# Altium PCB PCB1.PcbDoc (part 1 of 8)
Units mil, origin at the board's own origin, x right, y up, seen from the top; angles counter-clockwise.
Board outline 1968.5 x 1968.5 mil, 4 copper layers (Top Layer, Layer 1, Layer 2, Bottom Layer), stack 23.756 mil thick; 223 components, 143 nets, 652 pads, 329 vias.
Unrouted connection lines stored in the file: 15.
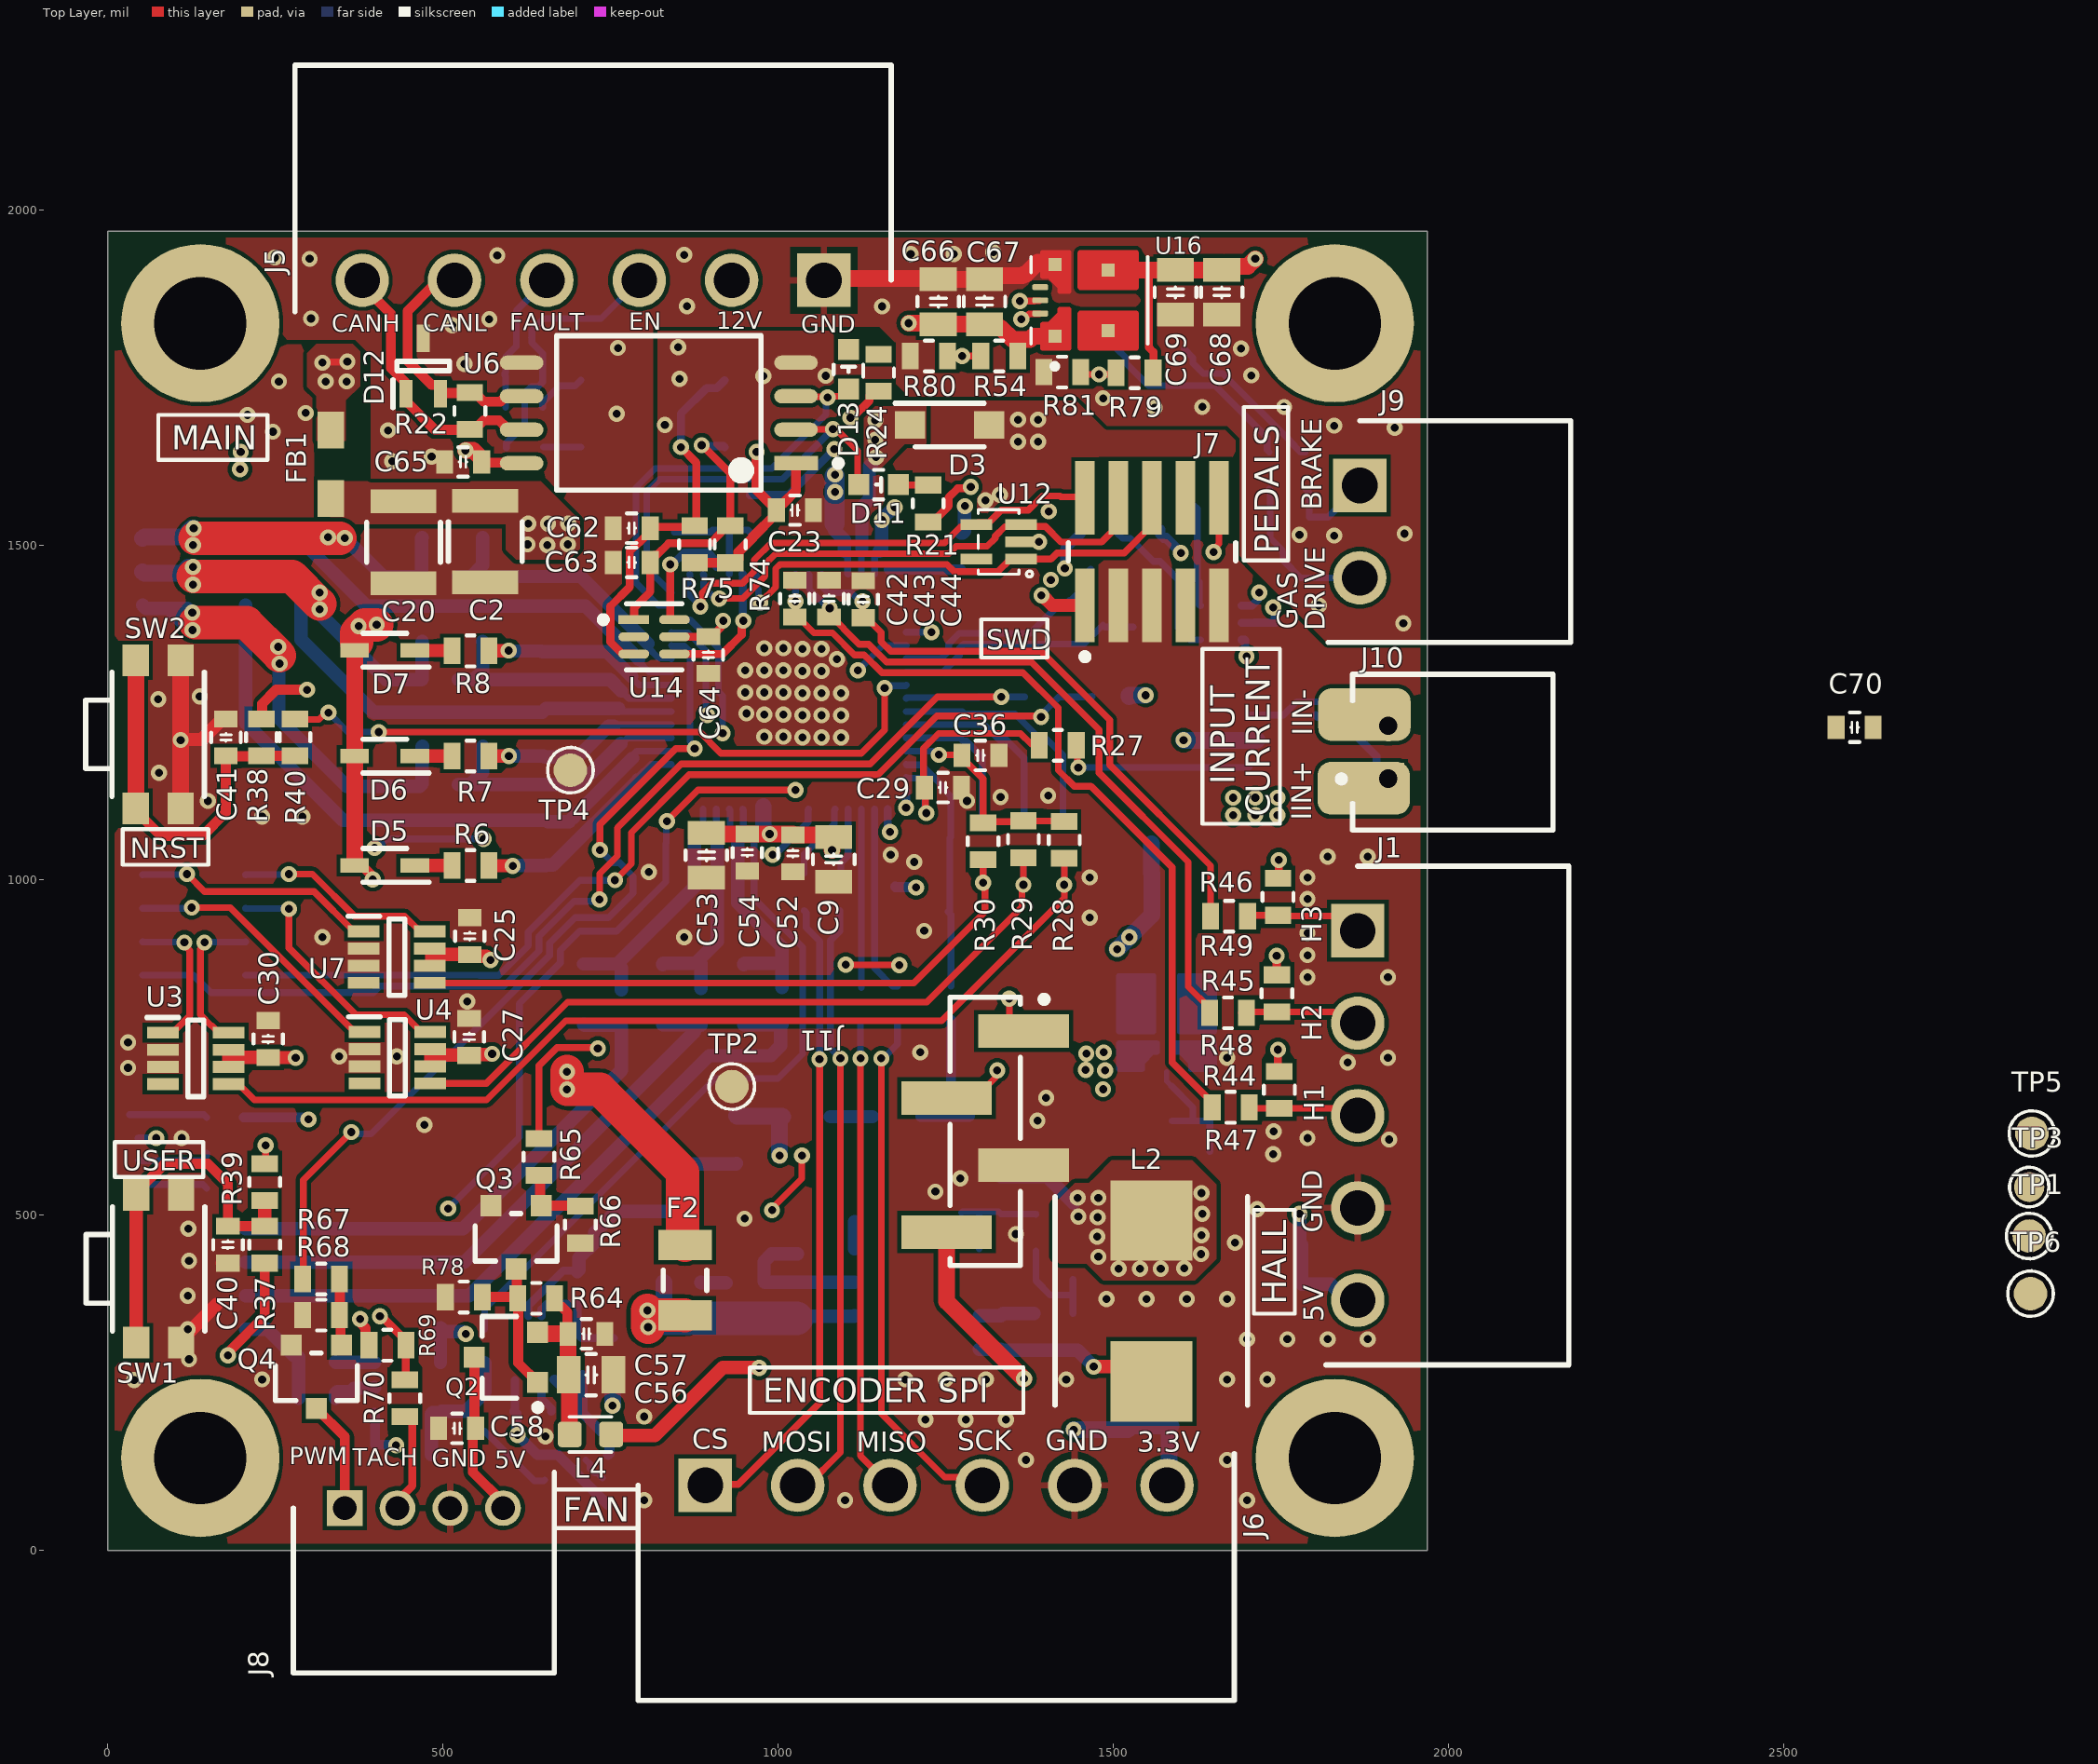
[diagram p0: Top Layer view]
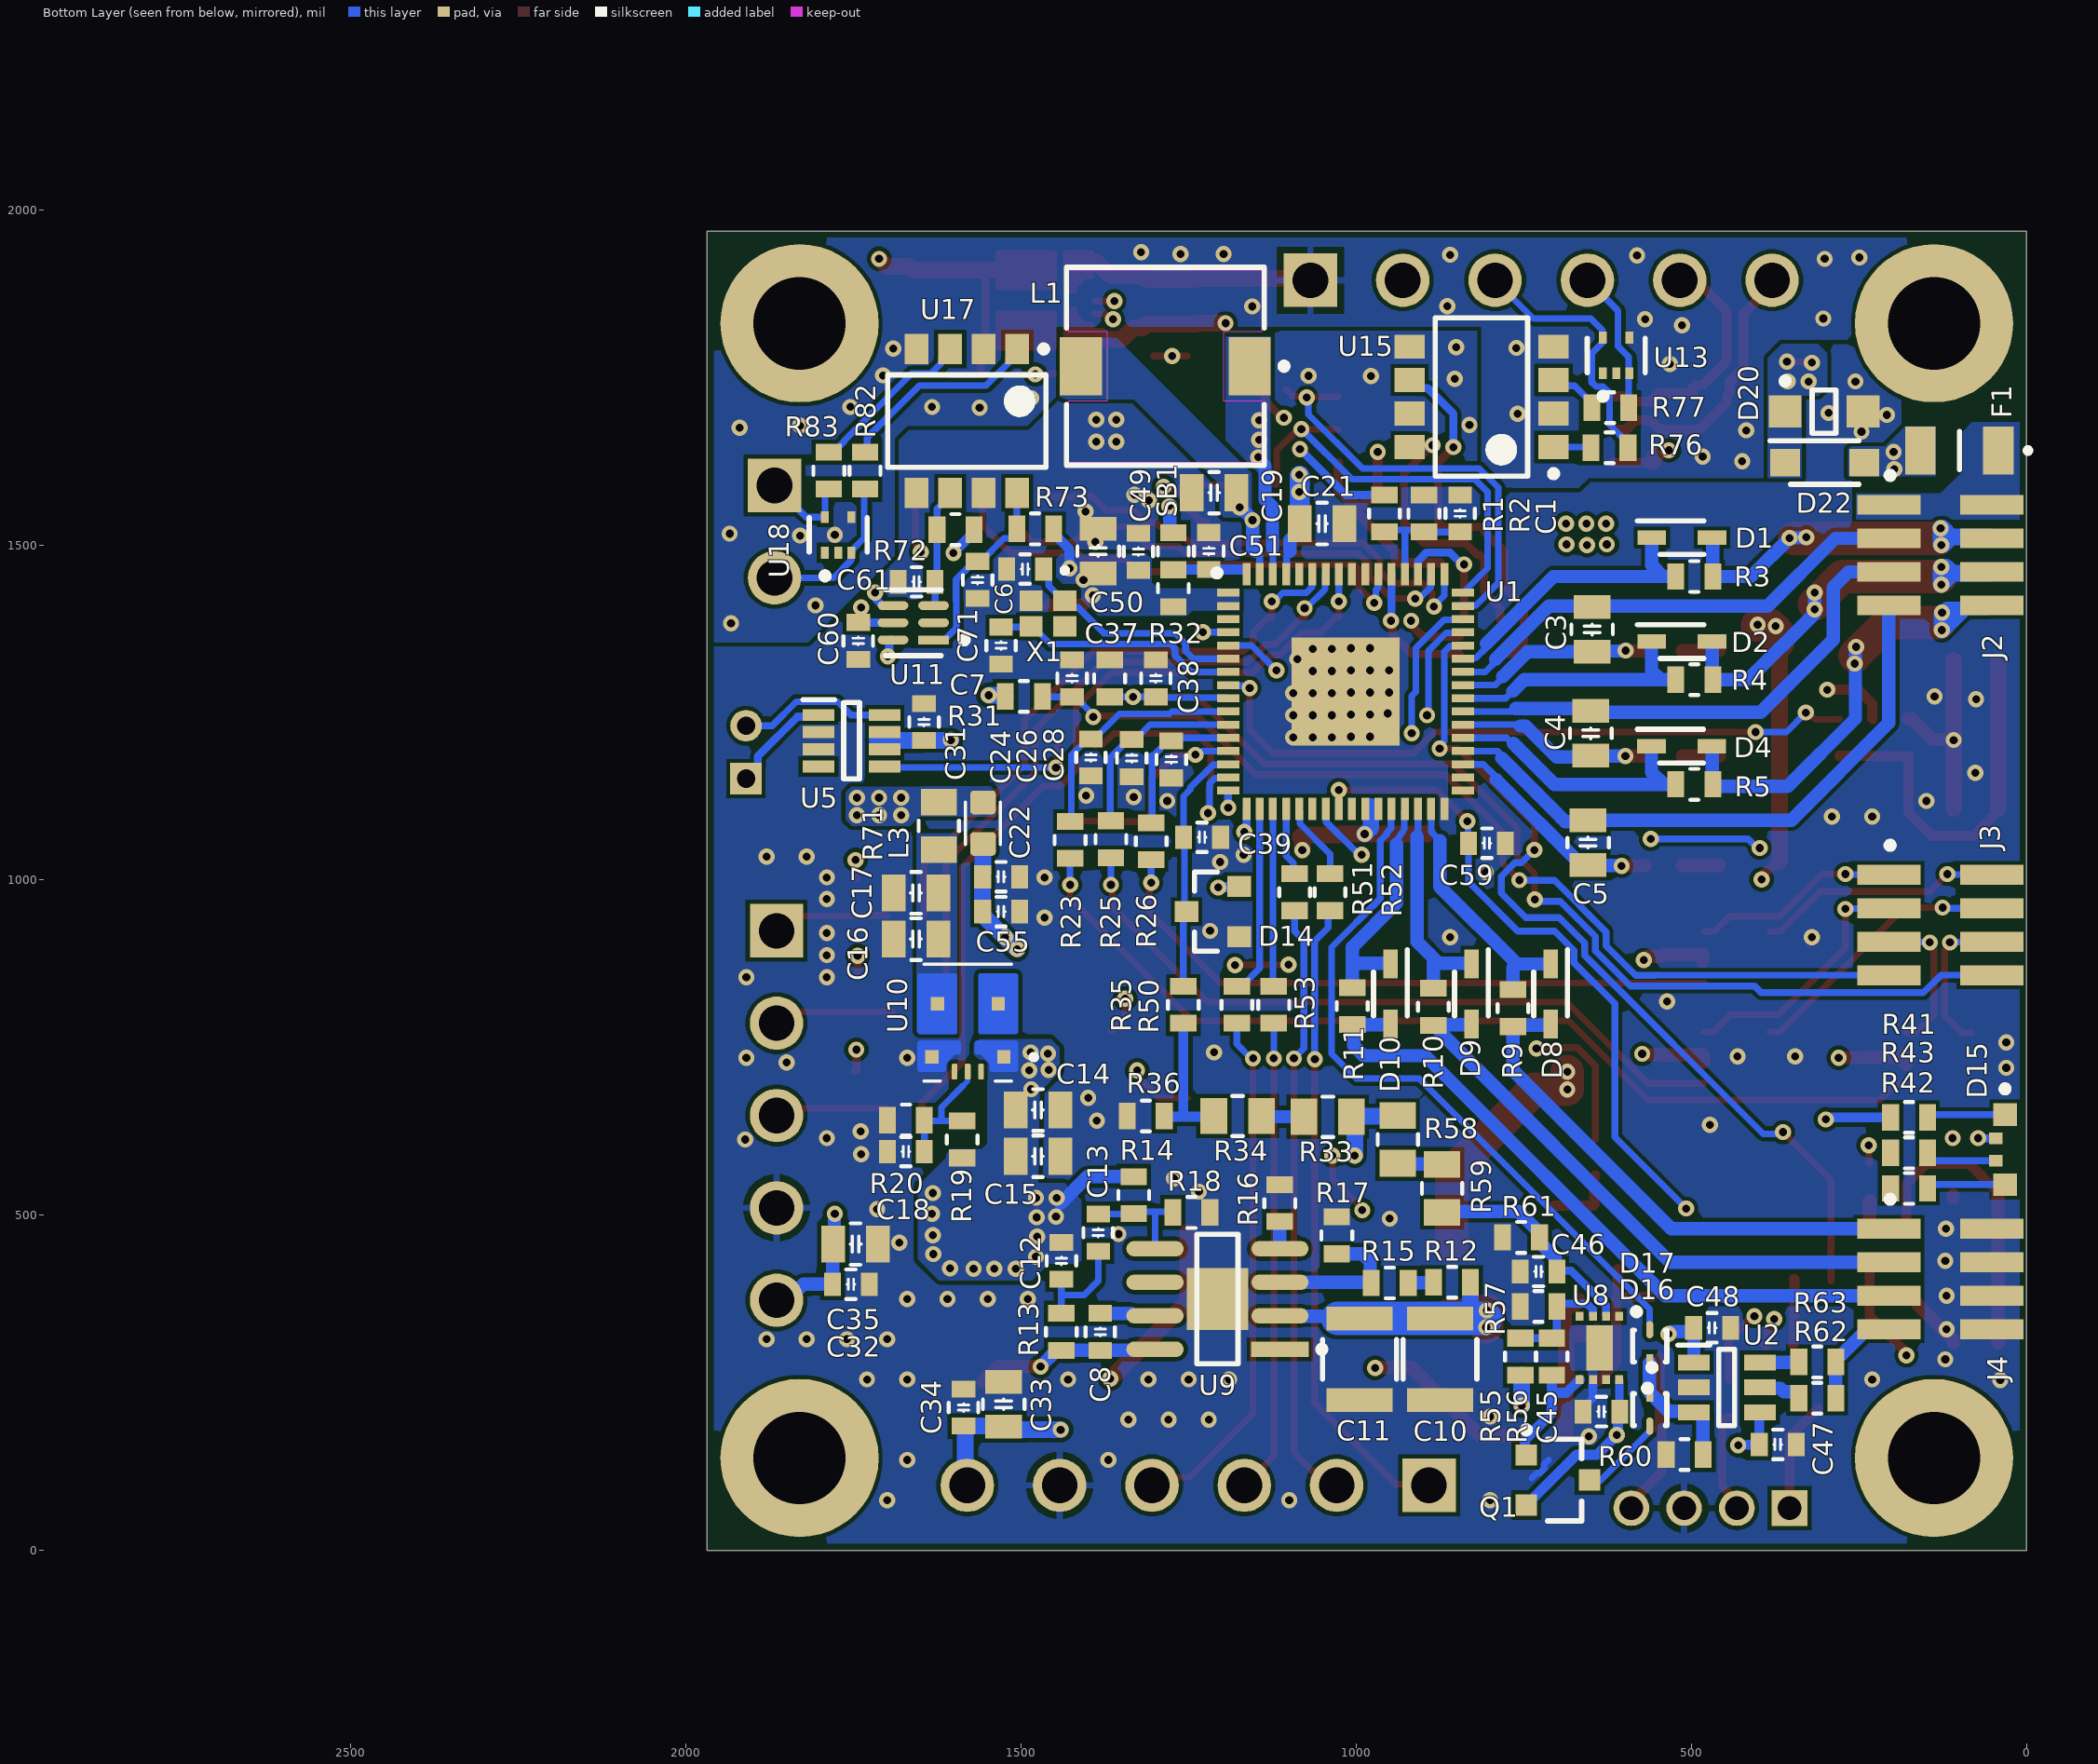
[diagram p1: Bottom Layer view, seen from below]
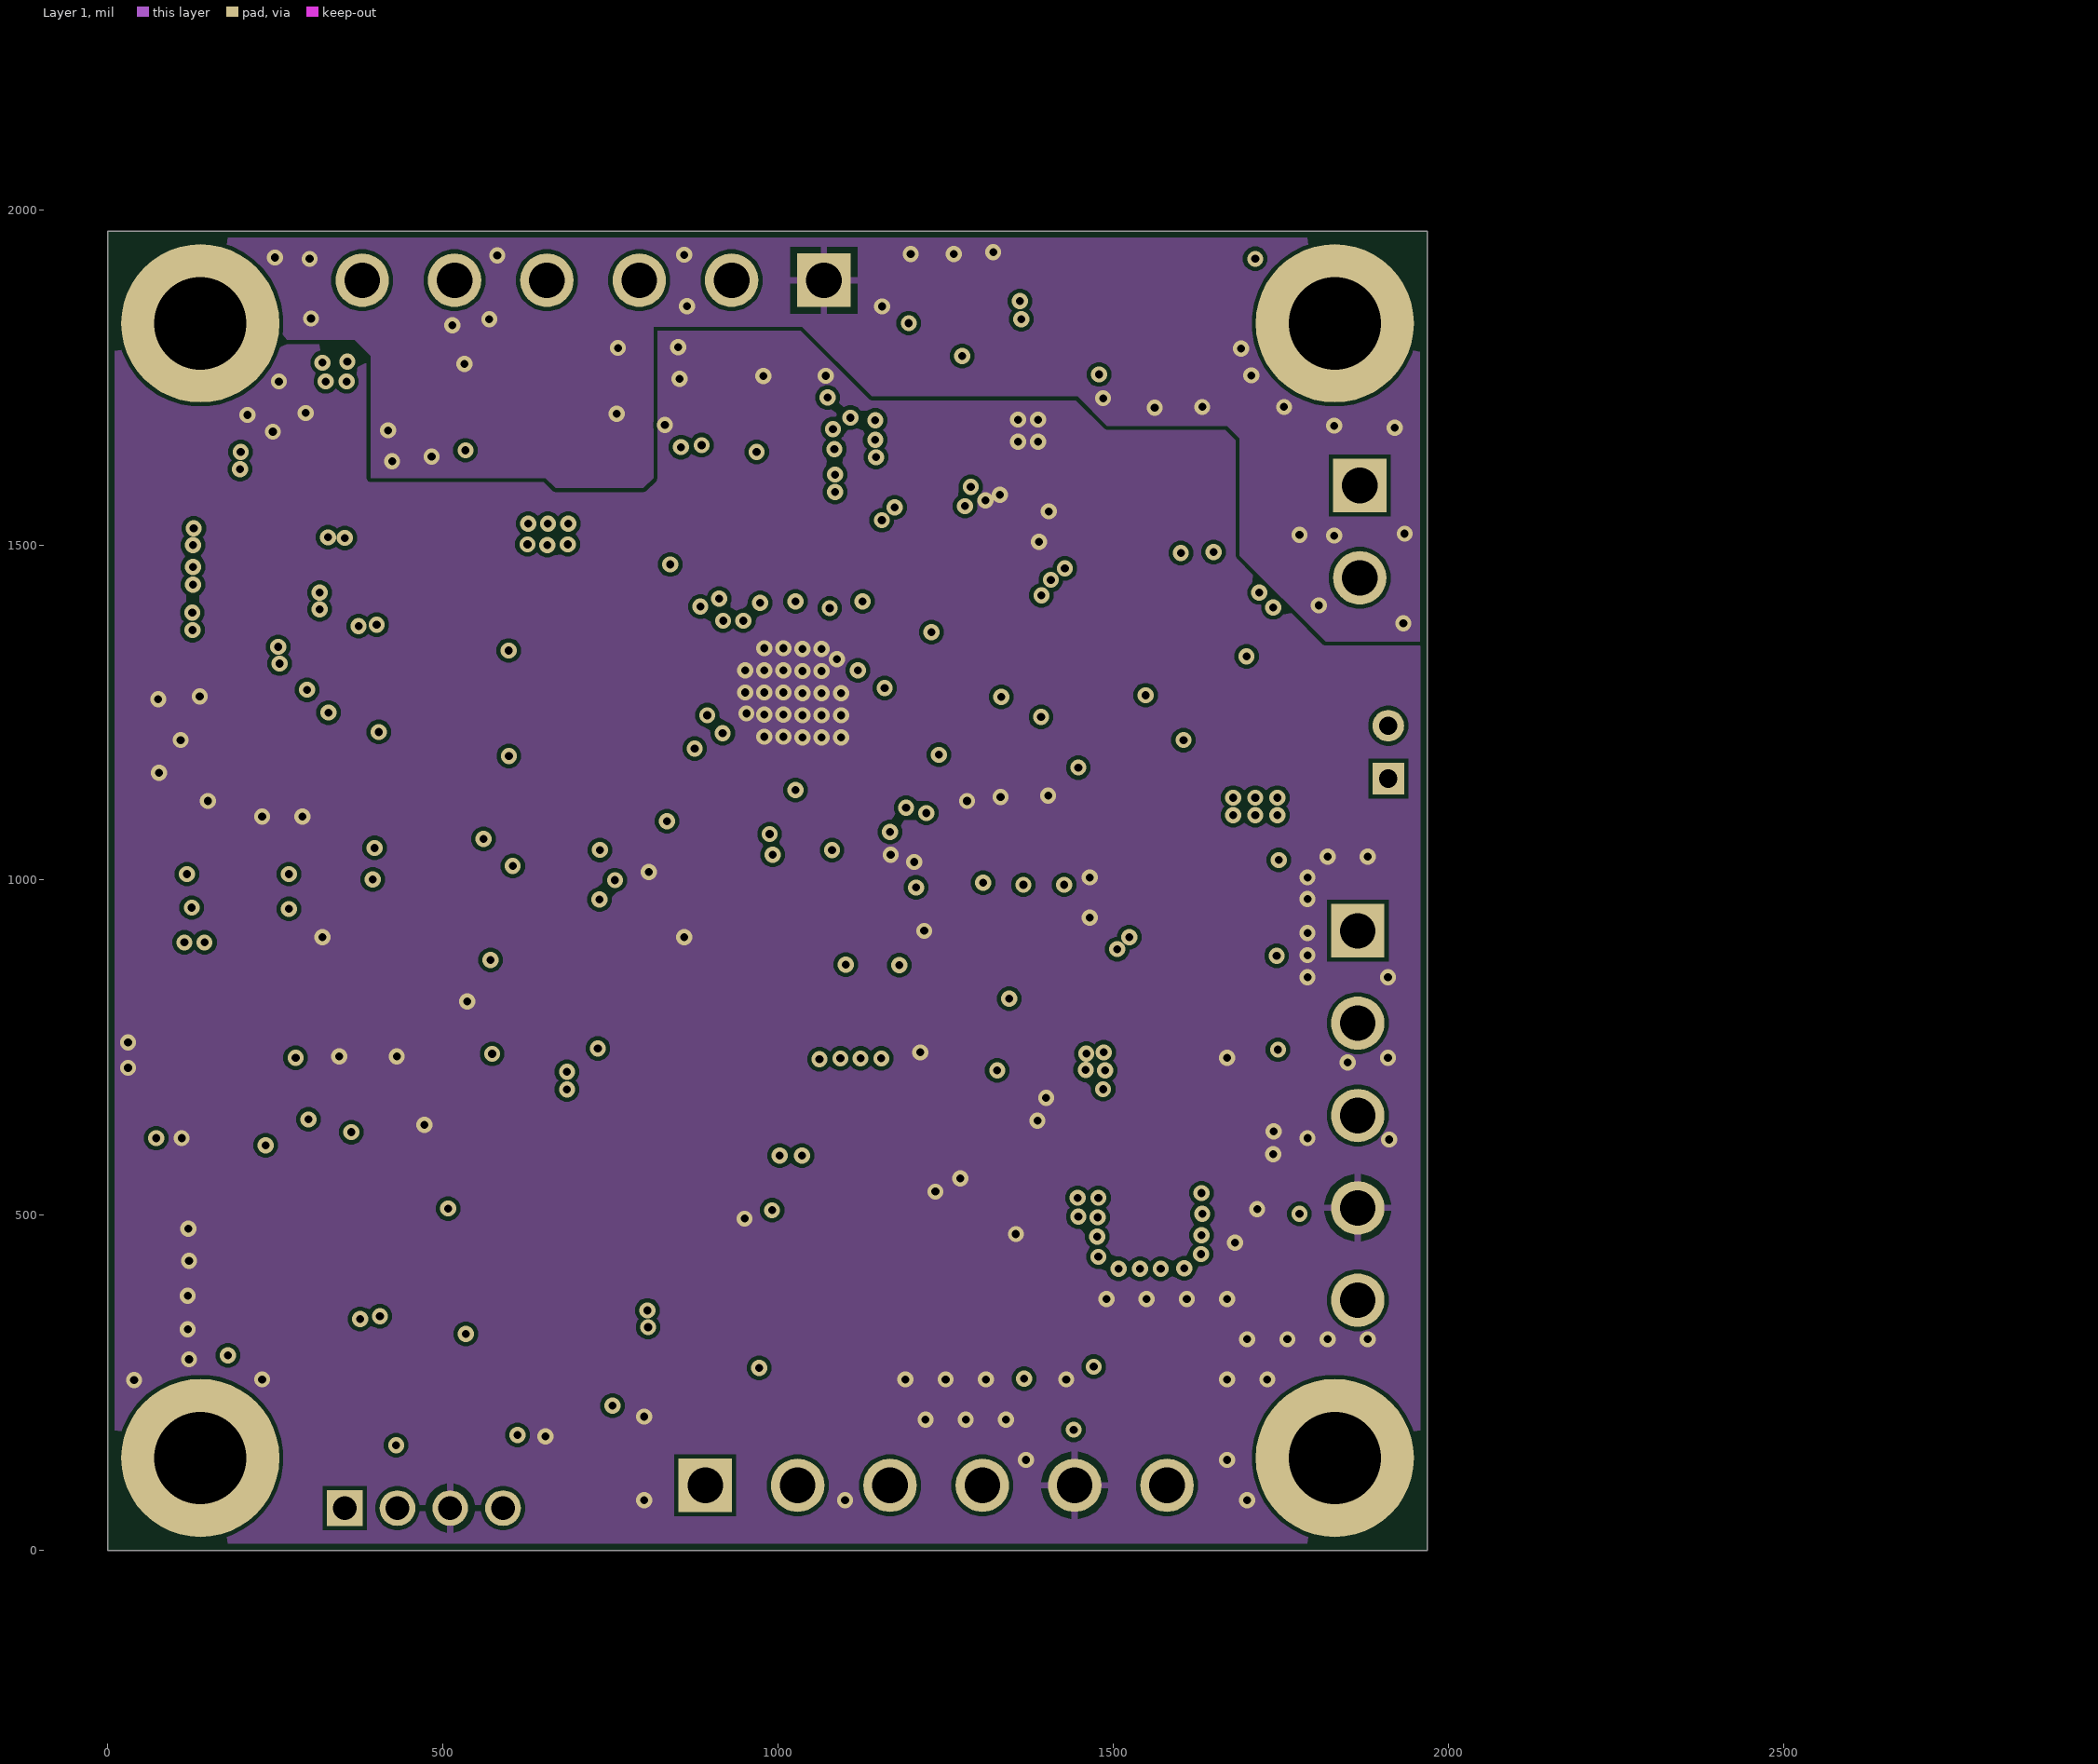
[diagram p2: Layer 1]
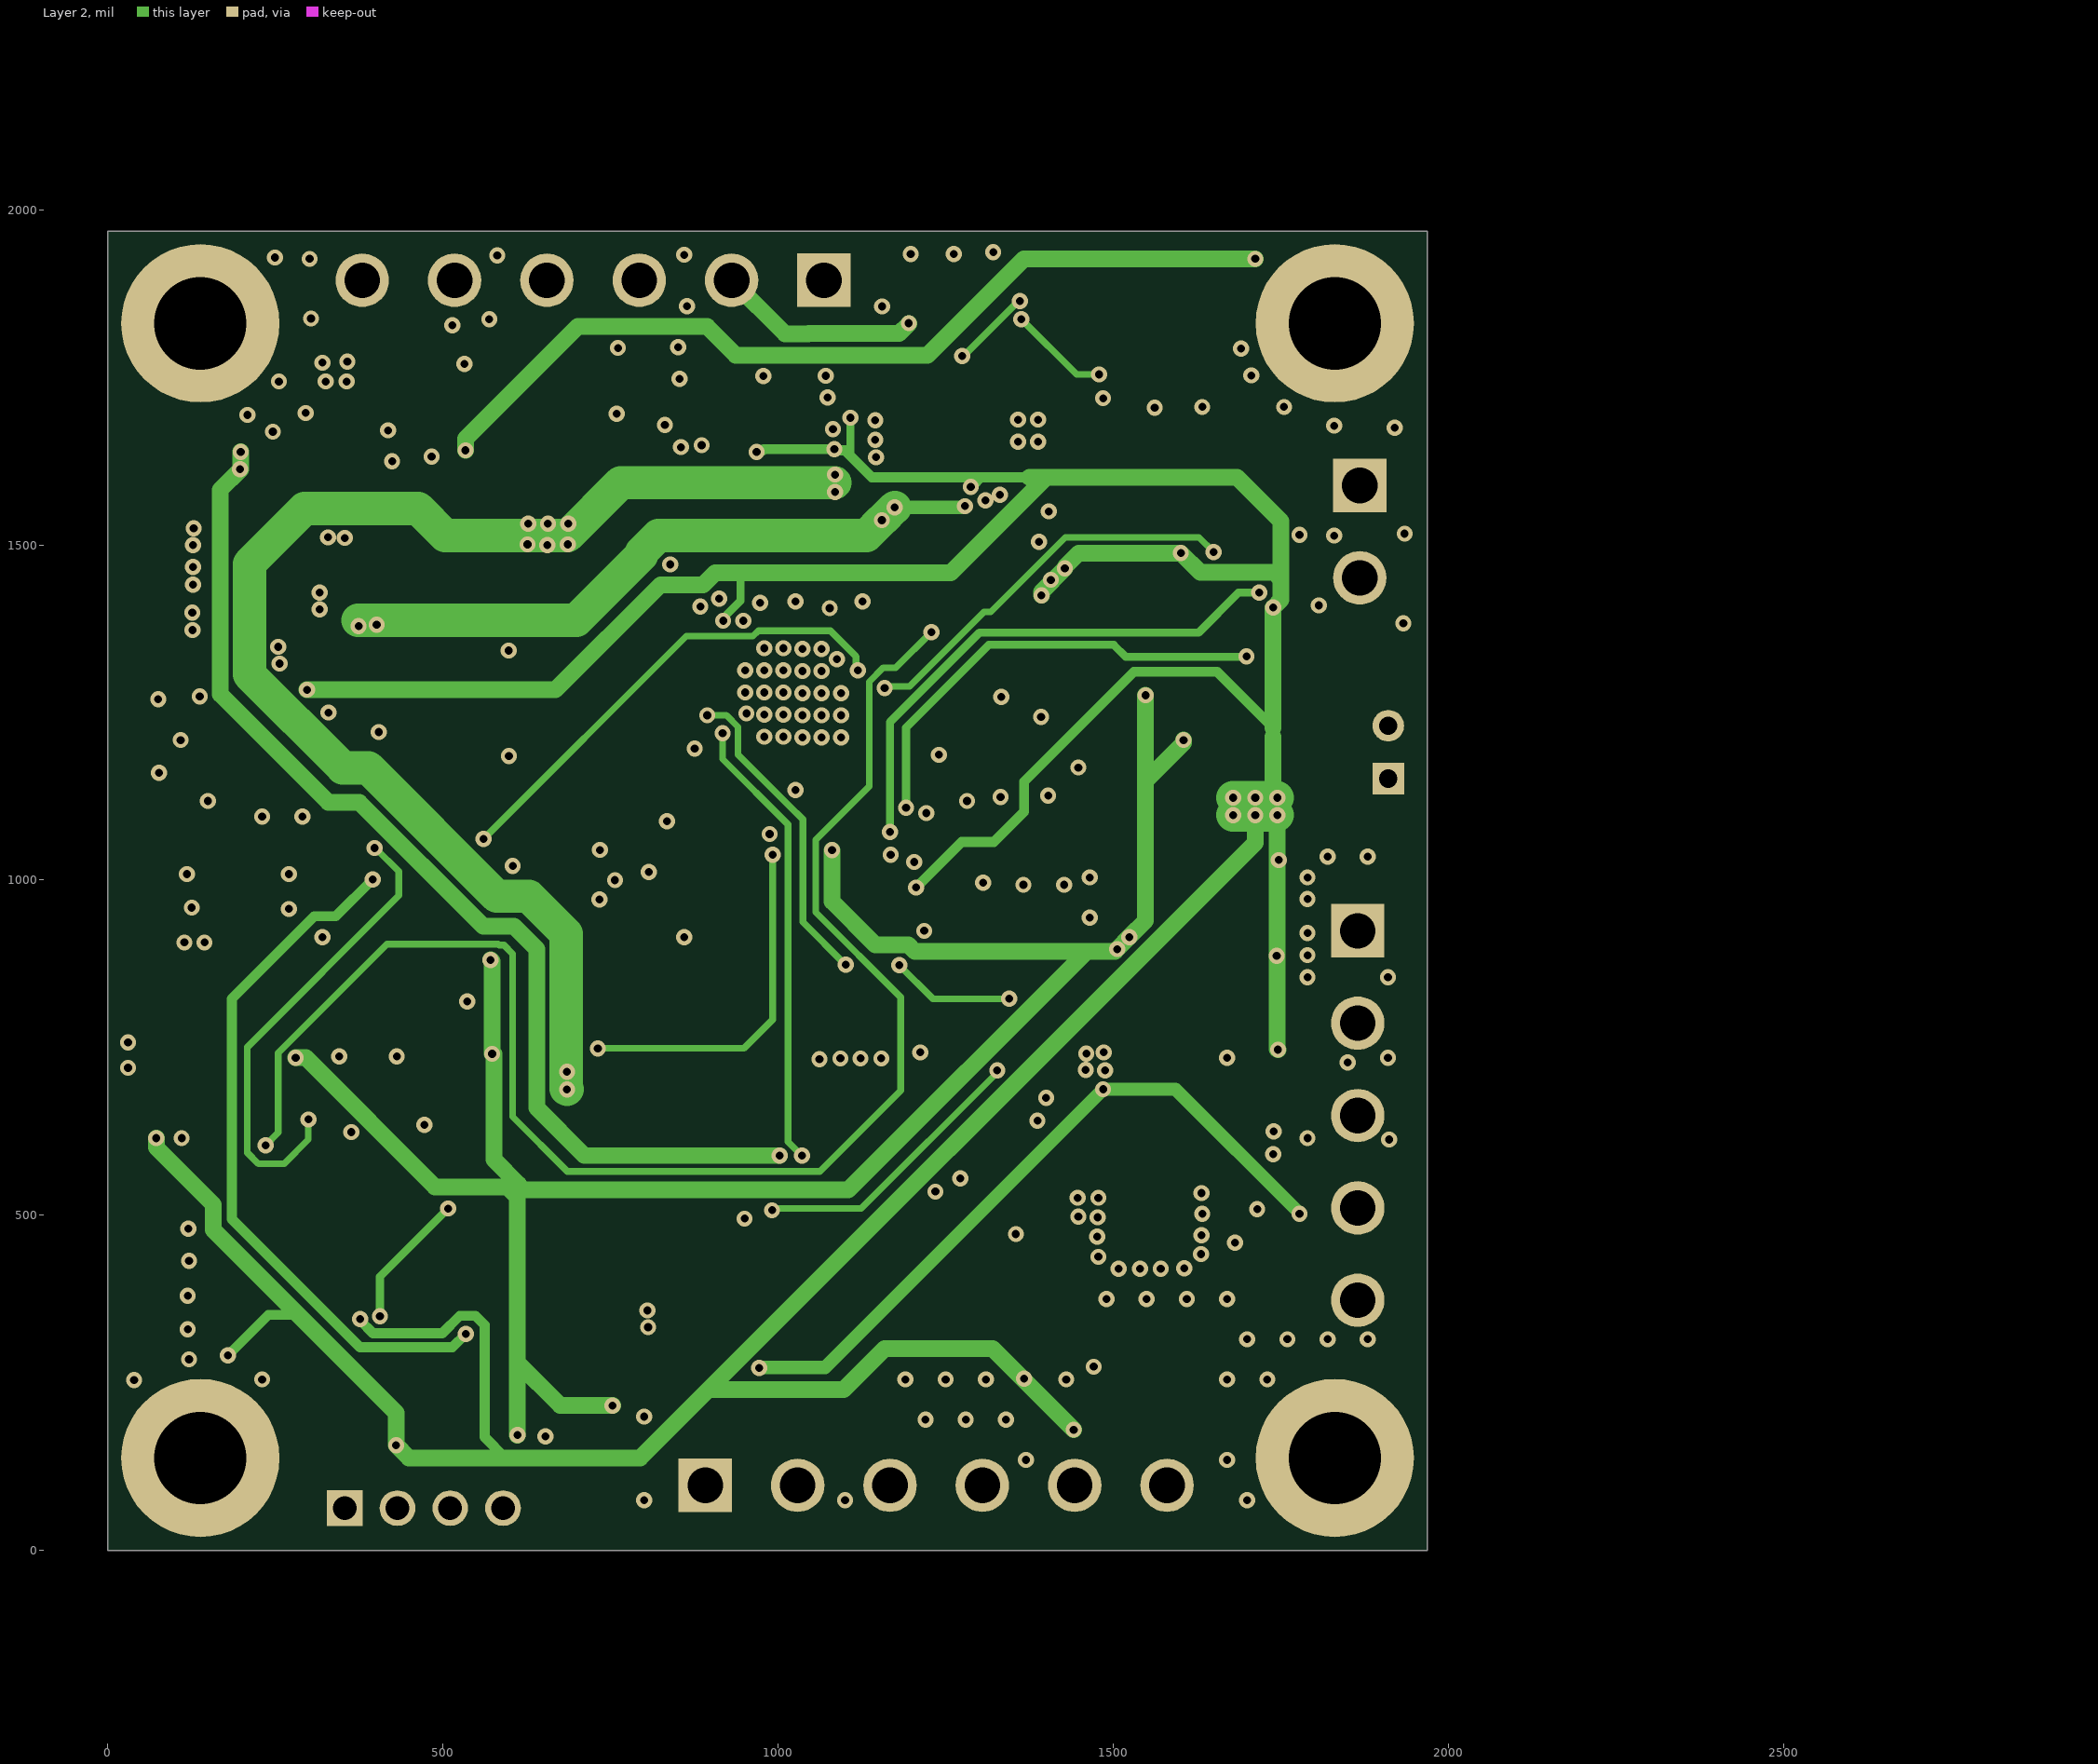
[diagram p3: Layer 2]

## Layer stack, top to bottom
Top Solder: solder mask 0.4, Solder Resist, Dk 3.5
Top Layer: signal copper 1.4
Dielectric 2: prepreg 2.8, PP-006, Dk 4.1
Layer 1: signal copper 1.378
Dielectric 1: dielectric 12.6, FR-4, Dk 4.8
Layer 2: signal copper 1.378
Dielectric 3: prepreg 2.8, PP-006, Dk 4.1
Bottom Layer: signal copper 1.4
Bottom Solder: solder mask 0.4, Solder Resist, Dk 3.5

## Board outline
0,0 0,1968.5 1968.5,1968.5 1968.5,0

## Design rules (kind name [scope] priority, off if disabled: settings)
BoardOutlineClearance [All] p1: gap=10 ignorepadtopadclearanceinfootprint=FALSE except(0: Arc-SplitContinuation Track-SplitContinuation SMDPad-SplitContinuation THPad-SplitContinuation Via-SplitContinuation Fill-SplitContinuation Poly-SplitContinuation Region-SplitContinuation Text-SplitContinuation)
Clearance "Stitching GND" [IsStitchingVia and InNet('GND') vs (IsVia and (Not IsStitchingVia)) Or IsPad] p1: gap=11.81 ignorepadtopadclearanceinfootprint=FALSE
Clearance [All] p2: gap=6 ignorepadtopadclearanceinfootprint=TRUE
DiffPairsRouting [All] p1: maxlimit=10 minlimit=10 mostfreqgap=10 toplayer_minwidth=15 toplayer_maxwidth=15 toplayer_prefwidth=15 midlayer1_minwidth=15 midlayer1_maxwidth=15 midlayer1_prefwidth=15 midlayer2_minwidth=15 midlayer2_maxwidth=15 midlayer2_prefwidth=15 bottomlayer_minwidth=15 bottomlayer_maxwidth=15 bottomlayer_prefwidth=15 maxuncoupledlength=500
PolygonConnect [All] p1: thpad.connectstyle=Relief thpad.reliefconductorwidth=10 thpad.reliefentries=4 thpad.polygonreliefangle="90 Angle" thpad.airgapwidth=10 smdpad.connectstyle=Direct smdpad.reliefconductorwidth=10 smdpad.reliefentries=4 smdpad.polygonreliefangle="90 Angle" smdpad.airgapwidth=10 via.connectstyle=Direct via.reliefconductorwidth=10 via.reliefentries=4 via.polygonreliefangle="90 Angle" via.airgapwidth=10
RoutingVias [All] p1: holewidth=12 width=24 viastyle="Through Hole" minholewidth=10 minwidth=20 maxholewidth=28 maxwidth=50
SolderMaskExpansion [All] p1: expansion=4 istentingtop=FALSE
SupplyNets "Schematic Supply Nets_11" [InNet('5V_EXT')] p1: voltage=0.000
SupplyNets "Schematic Supply Nets_10" [InNet('12V_EXT')] p2: voltage=0.000
SupplyNets "Schematic Supply Nets_9" [InNet('GND_EXT')] p3: voltage=0.000
SupplyNets "Schematic Supply Nets_8" [InNet('VM_SENSE')] p4: voltage=0.000
SupplyNets "Schematic Supply Nets_7" [InNet('5V_FAN')] p5: voltage=0.000
SupplyNets "Schematic Supply Nets_6" [InNet('3V3_TPSM')] p6: voltage=0.000
SupplyNets "Schematic Supply Nets_5" [InNet('3V3_A')] p7: voltage=0.000
SupplyNets "Schematic Supply Nets_4" [InNet('VM')] p8: voltage=0.000
SupplyNets "Schematic Supply Nets_3" [InNet('5V')] p9: voltage=0.000
SupplyNets "Schematic Supply Nets_2" [InNet('GND')] p10: voltage=0.000
SupplyNets "Schematic Supply Nets_1" [InNet('VCC')] p11: voltage=0.000
SupplyNets "Schematic Supply Nets" [InNet('3V3')] p12: voltage=0.000
Width [All] p1: maxlimit=100 minlimit=10 preferedwidth=10
29 further rules are at their usual default settings.

## Classes and differential pairs
component class power: C8 C10 C11 C12 C13 C14 C15 C16 C17 C18 C22 C55 C66 C67 C68 C69 C70 F2 L2 L3 R12 R13 R14 R15 R16 R17 R18 R19 R20 R54 R71 R79 R80 R81 TP1 TP2 TP5 TP6 U9 U10 U16
component class main: C32 C33 C34 C35 D20 D22 F1 FB1 J1 J2 J3 J4 J5 J6 J7 J8 J9 J10 J11 U12
component class stspin32g4: C1 C2 C3 C4 C5 C6 C7 C9 C19 C20 C21 C37 C38 C40 C41 C49 C50 C51 C52 C53 C54 D1 D2 D3 D4 D5 D6 D7 D8 D9 D10 D15 L1 R1 R2 R3 R4 R5 R6 R7 R8 R9 R10 R11 R31 R32 R37 R38 R39 R40 R41 R42 R43 R50 R51 R52 R53 SB1 SW1 SW2 U1 X1
component class peripherals: C23 C24 C25 C26 C27 C28 C29 C30 C31 C36 C39 C42 C43 C44 C45 C46 C47 C48 C56 C57 C58 C59 C60 C61 C62 C63 C64 C65 C71 D11 D12 D13 D14 D16 D17 L4 Q1 Q2 Q3 Q4 R21 R22 R23 R24 R25 R26 R27 R28 R29 R30 R33 R34 R35 R36 R44 R45 R46 R47 R48 R49 R55 R56 R57 R58 R59 R60 R61 R62 R63 R64 R65 R66 R67 R68 R69 R70 R72 R73 R74 R75 R76 R77 R78 R82 R83 TP3 TP4 U2 U3 U4 U5 U6 U7 U8 U11 U13 U14 U15 U17 U18
differential pair CAN: +CAN_P -CAN_N

## Components (designator, comment, footprint, x,y, rotation, side; value= is the part's Value field where it differs from the comment)
C1 "100n (0603)" C0603 845,1547 r270 bottom value=100nF
C2 "2u2 (1210)" WCAP-CSGP_1210_L3.2W2.5H2.5 563,1505 r90 top
C3 "4u7 (0805)" C0805 648,1374 r270 bottom value=4.7µF
C4 "4u7 (0805)" C0805 650,1219 r270 bottom value=4.7µF
C5 "4u7 (0805)" C0805 654,1056 r270 bottom value=4.7µF
C6 "12p (0603)" C0603 1494,1464 r180 bottom value=100nF
C7 "12p (0603)" C0603 1530,1350 r90 bottom value=100nF
C8 "1n (0603)" C0603 1382,326 r90 bottom value=100nF
C9 "4u7 (0805)" C0805 1083,1031 r270 top value=4.7µF
C10 "2u2 (1210)" WCAP-CSGP_1210_L3.2W2.5H2.5 875.02,285 r90 bottom
C11 "2u2 (1210)" WCAP-CSGP_1210_L3.2W2.5H2.5 995.02,285 r90 bottom
C12 "1n (0603)" C0603 1440,432 r90 bottom value=100nF
C13 "1n (0603)" C0603 1385,474 r270 bottom value=100nF
C14 "22u (0805)" C0805 1475,657 r0 bottom value=4.7µF
C15 "100n (0805)" C0805 1475,588 r0 bottom value=4.7µF
C16 "22u (0805)" C0805 1657,912 r180 bottom value=4.7µF
C17 "22u (0805)" C0805 1657,981 r180 bottom value=4.7µF
C18 "10n (0603)" C0603 1672,595 r180 bottom value=100nF
C19 "4u7 (0805)" C0805 1212,1578 r0 bottom value=4.7µF
C20 "2u2 (1210)" WCAP-CSGP_1210_L3.2W2.5H2.5 441,1504 r90 top
C21 "4u7 (0805)" C0805 1051,1532 r180 bottom value=4.7µF
C22 "4u7 (0603)" C0603 1530,1005 r0 bottom value=100nF
C23 "100n (0603)" C0603 1025,1552 r180 top value=100nF
C24 "2n2 (0603)" C0603 1396,1183 r90 bottom value=100nF
C25 "100n (0603)" C0603 540,916.44 r270 top value=100nF
C26 "2n2 (0603)" C0603 1335,1182 r90 bottom value=100nF
C27 "100n (0603)" C0603 539,766 r270 top value=100nF
C28 "2n2 (0603)" C0603 1276,1180 r90 bottom value=100nF
C29 "2n2 (0603)" C0603 1246,1138 r180 top value=100nF
C30 "100n (0603)" C0603 239,763 r270 top value=100nF
C31 "100n (0603)" C0603 1645,1236 r270 bottom value=100nF
C32 "100n (0603)" C0603 1754,397 r180 bottom value=100nF
C33 "4u7 (0805)" C0805 1526,218 r90 bottom value=4.7µF
C34 "100n (0603)" C0603 1586,213 r90 bottom value=100nF
C35 "4u7 (0805)" C0805 1747,457 r180 bottom value=4.7µF
C36 "2n2 (0603)" C0603 1302,1186 r180 top value=100nF
C37 "100n (0603)" C0603 1424,1301 r270 bottom value=100nF
C38 "100n (0603)" C0603 1299,1301 r270 bottom value=100nF
C39 "22n (0603)" C0603 1230,1064 r0 bottom value=100nF
C40 "100n (0603)" C0603 179,456 r270 top value=100nF
C41 "100n (0603)" C0603 176,1213 r90 top value=100nF
C42 "1n (0603)" C0603 1025,1420 r270 top value=100nF
C43 "1n (0603)" C0603 1076,1420 r270 top value=100nF
C44 "1n (0603)" C0603 1127,1419 r270 top value=100nF
C45 "2n2 (0603)" C0603 634,207 r180 bottom value=100nF
C46 "2n2 (0603)" C0603 728,416 r180 bottom value=100nF
C47 "2n2 (0603)" C0603 371,158 r0 bottom value=100nF
C48 "2n2 (0603)" C0603 469,332 r0 bottom value=100nF
C49 "100n (0603)" C0603 1325,1490 r90 bottom value=100nF
C50 "4u7 (0805)" C0805 1385,1491 r90 bottom value=4.7µF
C51 "100n (0603)" C0603 1220,1491 r90 bottom value=100nF
C52 "100n (0603)" C0603 1022,1040 r90 top value=100nF
C53 "4u7 (0805)" C0805 893,1037 r270 top value=4.7µF
C54 "100n (0603)" C0603 954,1041 r90 top value=100nF
C55 "100n (0603)" C0603 1530,953 r0 bottom value=100nF
C56 "10u (0805)" C0805 721,262 r0 top value=4.7µF
C57 "100n (0603)" C0603 714,323 r180 top value=100nF
C58 "100n (0603)" C0603 521,182 r0 top value=100nF
C59 "470p (0603)" C0603 805,1055 r0 bottom value=100nF
C60 "100n (0603)" C0603 1743,1357 r270 bottom value=100nF
C61 "1p (0603)" C0603 1656,1445 r0 bottom value=100nF
C62 "10n (0603)" C0603 781.64,1525 r180 top value=100nF
C63 "10n (0603)" C0603 781.64,1474 r180 top value=100nF
C64 "100n (0603)" C0603 896,1336 r270 top value=100nF
C65 "100n (0603)" C0603 530,1624 r0 top value=100nF
C66 "22u (0805)" C0805 1239,1863 r270 top value=4.7µF
C67 "100n (0805)" C0805 1308,1863 r270 top value=4.7µF
C68 "22u (0805)" C0805 1662,1877 r90 top value=4.7µF
C69 "22u (0805)" C0805 1593,1877 r90 top value=4.7µF
C70 "10n (0603)" C0603 2606.44,1228 r0 top value=100nF
C71 "1p (0603)" C0603 1565,1448 r270 bottom value=100nF
D1 "BAT48JFILM" SOD2513X117N 514,1511 r180 bottom
D2 "BAT48JFILM" SOD2513X117N 514,1356 r180 bottom
D3 "STPST1H100ZFY" SODFL3516X110N 1256,1679 r0 top
D4 "BAT48JFILM" SOD2513X117N 514.44,1200 r180 bottom
D5 "BAT48JFILM" SOD2513X117N 413,1022 r180 top
D6 "BAT48JFILM" SOD2513X117N 413,1185 r180 top
D7 "BAT48JFILM" SOD2513X117N 413,1343 r180 top
D8 "BAT48JFILM" SOD2513X117N 710,830 r270 bottom
D9 "BAT48JFILM" SOD2513X117N 828,830 r270 bottom
D10 "BAT48JFILM" SOD2513X117N 949,830 r270 bottom
D11 "LTST-C190KRKT" FP-LTST-C190KRKT-MFG 1150,1590 r0 top value=100µF
D12 "ESDCAN04-2BWY" SOT65P210X110-3N 470.52,1766.98 r90 top
D13 "LTST-C190KRKT" FP-LTST-C190KRKT-MFG 1105,1762 r90 top value=100µF
D14 "BAT54S-7-F" FP-SOT23-MFG#1 1214,953 r0 bottom
D15 "APFA2507LQBDSEEZGKC" FP-APFA2507LQBDSEEZGKC-MFG 22,598 r270 bottom
D16 "BAT30KFILM" FP-SOD-523-IPC_C 562,210 r270 bottom
D17 "BAT30KFILM" FP-SOD-523-IPC_C 562,304.67 r90 bottom
D20 "SMF58AT1G" ONSC-SOD-123FL-2-498_V 301.93,1699 r180 bottom
D22 "STPS2H100ZF" SODFL3516X110N 301,1623 r180 bottom
F1 "0470.500DR" 1206L075132WR 100,1641 r0 bottom
F2 "0466.375NRHF" FP-0466-MFG 861,403 r270 top
FB1 "742792096" WE-CBF_0805_L2W1.2H0.9_HC 332.66,1620.38 r270 top
J1 "1844249" SHDRRA5W80P0X350_1X5_1890X920X825P 1865,924.39 r270 top
J2 "62130821021" 62130821021 128.5,1485 r270 bottom
J3 "62130821021" 62130821021 128.5,933.03 r270 bottom
J4 "62130821021" 62130821021 128.5,405 r270 bottom
J5 "1844252" SHDRRA6W83P0X350_1X6_2240X920X825P 1068.39,1895 r0 top
J6 "1844252" SHDRRA6W83P0X350_1X6_2240X920X825P 891.41,97 r180 top
J7 "FTSH-105-01-L-DV-K" SMTC-FTSH-105-01-L-DV-K_V 1558,1490 r0 top
J8 "S4B-PH-K-S_LF__SN_" SHDRRA4W50P0X200_1X4_990X760X480P 353.26,63 r180 top
J9 "1844210" SHDRRA2W80P0X350_1X2_840X920X825P 1868,1588.8 r270 top
J10 "S2B-PH-K-S(LF)(SN)" JST-S2B-PH-K-S_V 2007,1191 r90 top
J11 "TSM-104-01-L-SV-P-TR" FP-TSM-104-01-L-SV-P-TR-MFG 1309,625 r90 top
L1 "744778118" WE-PD_7332 1284.92,1766.74 r0 bottom
L2 "SRP7050WA-330M" SRP7050WA-330M 1557,372 r90 top
L3 "MPZ1608S601ATA00" INDC1608X95N 1557,1085 r270 bottom
L4 "MPZ1608S601ATA00" INDC1608X95N 720,173 r180 top
Q1 "AO3401A" AO-SOT-23-3L_V 699,105 r180 bottom
Q2 "AO3401A" AO-SOT-23-3L_V 594,288 r180 top
Q3 "AO3400A" FP-SOT23-MFG#2 609,467 r270 top
Q4 "AO3400A" FP-SOT23-MFG#2 311,259 r270 top
R1 "68R (0603)" R0603 958,1547 r90 bottom value=10kΩ
R2 "68R (0603)" R0603 899,1547 r270 bottom value=10kΩ
R3 "68R (0603)" R0603 495.44,1453 r180 bottom value=10kΩ
R4 "68R (0603)" R0603 495.44,1299 r180 bottom value=10kΩ
R5 "68R (0603)" R0603 495.44,1143 r180 bottom value=10kΩ
R6 "68R (0603)" R0603 541,1022 r0 top value=10kΩ
R7 "68R (0603)" R0603 541,1185 r0 top value=10kΩ
R8 "68R (0603)" R0603 541,1342 r0 top value=10kΩ
R9 "68R (0603)" R0603 766,809 r270 bottom value=10kΩ
R10 "68R (0603)" R0603 885,811 r270 bottom value=10kΩ
R11 "68R (0603)" R0603 1006,812 r270 bottom value=10kΩ
R12 "100k (0603)" R0603 857,400 r180 bottom value=10kΩ
R13 "100k (0603)" R0603 1440,326 r270 bottom value=10kΩ
R14 "100k (0603)" R0603 1332,530 r90 bottom value=10kΩ
R15 "100k (0603)" R0603 950,399 r180 bottom value=10kΩ
R16 "100k (0603)" R0603 1114,518 r270 bottom value=10kΩ
R17 "100k (0603)" R0603 1029,470 r270 bottom value=10kΩ
R18 "100k (0603)" R0603 1246,504 r0 bottom value=10kΩ
R19 "100k (0603)" R0603 1588,613 r270 bottom value=10kΩ
R20 "100k (0603)" R0603 1672,642 r180 bottom value=10kΩ
R21 "2k (0603)" R0603 1224,1562 r90 top value=10kΩ
R22 "120R (0603)" R0603 540,1700 r270 top value=10kΩ
R23 "68R (0603)" R0603 1427,1060 r90 bottom value=10kΩ
R24 "2k (0603)" R0603 1150,1757 r90 top value=10kΩ
R25 "68R (0603)" R0603 1366,1061 r90 bottom value=10kΩ
R26 "68R (0603)" R0603 1306,1058 r90 bottom value=10kΩ
R27 "68R (0603)" R0603 1417.44,1201 r180 top value=10kΩ
R28 "1k (0603)" R0603 1427,1060 r270 top value=10kΩ
R29 "1k (0603)" R0603 1366,1061 r270 top value=10kΩ
R30 "1k (0603)" R0603 1306,1058 r270 top value=10kΩ
R31 "120R (0603)" R0603 1496,1274 r180 bottom value=10kΩ
R32 "120R (0603)" R0603 1368,1301 r270 bottom value=10kΩ
R33 "75k (0805)" R0805 1042.49,647 r180 bottom value=4.7Ω
R34 "75k (0805)" R0805 1177,648 r180 bottom value=4.7Ω
R35 "68R (0603)" R0603 1258,814 r90 bottom value=10kΩ
R36 "6k34 (0603)" R0603 1314,648 r180 bottom value=10kΩ
R37 "10k (0603)" R0603 234,456 r270 top value=10kΩ
R38 "10k (0603)" R0603 229,1213 r90 top value=10kΩ
R39 "200R (0603)" R0603 234,549.44 r90 top value=10kΩ
R40 "200R (0603)" R0603 279,1213 r90 top value=10kΩ
R41 "680R (0603)" R0603 175,646 r0 bottom value=10kΩ
R42 "270R (0603)" R0603 175,540 r0 bottom value=10kΩ
R43 "270R (0603)" R0603 175,593 r0 bottom value=10kΩ
R44 "2k2 (0603)" R0603 1748,687 r90 top value=10kΩ
R45 "2k2 (0603)" R0603 1744.44,831 r90 top value=10kΩ
R46 "2k2 (0603)" R0603 1746,975 r90 top value=10kΩ
R47 "100R (0603)" R0603 1675.44,661 r180 top value=10kΩ
R48 "100R (0603)" R0603 1671.44,802 r180 top value=10kΩ
R49 "100R (0603)" R0603 1673,946 r180 top value=10kΩ
R50 "33R (0603)" R0603 1178,814 r270 bottom value=10kΩ
R51 "33R (0603)" R0603 1092,982 r270 bottom value=10kΩ
R52 "33R (0603)" R0603 1039,982 r90 bottom value=10kΩ
R53 "33R (0603)" R0603 1123,814 r270 bottom value=10kΩ
R54 "100k (0603)" R0603 1330,1782 r0 top value=10kΩ
R55 "1k (0603)" R0603 755,289 r90 bottom value=10kΩ
R56 "1k (0603)" R0603 708,289 r270 bottom value=10kΩ
R57 "1k (0603)" R0603 728,364 r0 bottom value=10kΩ
R58 "75k (0805)" R0805 938,613 r90 bottom value=4.7Ω
R59 "75k (0805)" R0805 872,540 r90 bottom value=4.7Ω
R60 "1k (0603)" R0603 510,143 r0 bottom value=10kΩ
R61 "6k34 (0603)" R0603 754,467 r180 bottom value=10kΩ
R62 "1k (0603)" R0603 312,227 r0 bottom value=10kΩ
R63 "1k (0603)" R0603 312,281 r0 bottom value=10kΩ
R64 "47k (0603)" R0603 639,376 r180 top value=10kΩ
R65 "100R (0603)" R0603 643,587 r270 top value=10kΩ
R66 "100k (0603)" R0603 705,486 r270 top value=10kΩ
R67 "100R (0603)" R0603 318,404.93 r0 top value=10kΩ
R68 "100k (0603)" R0603 318,351 r180 top value=10kΩ
R69 "100k (0603)" R0603 417,306 r180 top value=10kΩ
R70 "100k (0603)" R0603 443,227 r90 top value=10kΩ
R71 "75k (0805)" R0805 1623,1081 r270 bottom value=4.7Ω
R72 "1k (0603)" R0603 1598,1523 r180 bottom value=10kΩ
R73 "1k (0603)" R0603 1479,1524 r180 bottom value=10kΩ
R74 "22k (0603)" R0603 928.46,1500.96 r270 top value=10kΩ
R75 "22k (0603)" R0603 875.46,1500.96 r270 top value=10kΩ
R76 "680R (0603)" R0603 622,1645 r0 bottom value=10kΩ
R77 "680R (0603)" R0603 621,1705 r0 bottom value=10kΩ
R78 "10k (0603)" R0603 531,378 r180 top value=10kΩ
R79 "100k (0603)" R0603 1532,1757 r0 top value=10kΩ
R80 "100k (0603)" R0603 1225,1782 r0 top value=10kΩ
R81 "100k (0603)" R0603 1424,1758 r0 top value=10kΩ
R82 "680R (0603)" R0603 1733,1611 r90 bottom value=10kΩ
R83 "680R (0603)" R0603 1787,1611 r90 bottom value=10kΩ
SB1 "triple_solder_jumper" triple_solder_jumper 1273,1463 r90 bottom
SW1 "434351045816" 434351045816 75.66,420 r270 top
SW2 "434351045816" 434351045816 75,1217.5 r270 top
TP1 "TP" Test_Point_50 2867,469 r0 top
TP2 "TP" Test_Point_50 931,692 r0 top
TP3 "TP" Test_Point_45 2867,542 r0 top
TP4 "TP" Test_Point_50 690,1164 r0 top
TP5 "TP" Test_Point_50 2871,622 r0 top
TP6 "TP" Test_Point_50 2869,383 r0 top
U1 "STSPIN32G4" QFN50P900X900X100-65N-D 1016,1281.2 r180 bottom
U2 "PM8851D" SOT95P280X145-6N 447,243 r180 bottom
U3 "INA241A2IDDFR" SOT65P280X110-8N 131,734 r0 top
U4 "INA241A2IDDFR" SOT65P280X110-8N 432,735 r0 top
U5 "INA241A1IDDFR" SOT65P280X110-8N 1753,1208 r180 bottom
U6 "ISO1042QDWVRQ1" FP-DWV0008A-IPC_C 822,1697 r180 top
U7 "INA241A2IDDFR" SOT65P280X110-8N 431,885 r0 top
U8 "TS3011IYQ3T" SON50P200X200X80-9N 637,302 r270 bottom
U9 "LM5164QDDARQ1" FP-DDA0008A-IPC_B 1207,375 r0 bottom
U10 "TPSM863253RDXR" TPSM863253RDXR 1579.67,789 r0 bottom
U11 "SN74LVC2G14IDCKRQ1" FP-DCK0006A-IPC_C 1661,1384 r0 bottom
U12 "ESDALC6V1W5" ESDALC6V1W5 1329.16,1504.72 r90 top
U13 "TPD2E2U06DRLR" FP-DRL0005A-MFG 612,1783 r90 bottom
U14 "SN74LVC2G14IDCKRQ1" FP-DCK0006A-IPC_C 815,1363 r0 top
U15 "ILD207T" VISH-SOIC-8_C_V 813,1721 r0 bottom
U16 "TPSM863253RDXR" TPSM863253RDXR 1466,1865 r90 top
U17 "ILD207T" VISH-SOIC-8_C_V 1581,1685 r270 bottom
U18 "TPD2E2U06DRLR" FP-DRL0005A-MFG 1773,1515 r90 bottom
X1 "ABM11W-24.0000MHZ-8-D1X-T3" XTAL_ABM11W-24.0000MHZ-8-D1X-T3 1460,1398 r270 bottom

## Footprints (in the part's own frame and the unit in brackets; to place one, negate y for a bottom-side part, rotate by r counter-clockwise, add the part's x,y. Pads: shape width x height; smd on the part's side, far side on the other; paste and mask are expansions set on the pad)
1206L075132WR [mm]
  rect 1.16x1.82 smd: 1(-1.475,0) 2(1.475,0)
  silkscreen extent -2.7,-0.72 0,0.72, body extent -1.6,-0.83 1.6,0.83, height 1.25
62130821021 [mm] "Pin Header, pitch 1.27 mm, SMD, Vertical, dual row, 8p"
  rect 0.75x2.4 smd: 1(-1.905,-1.95) 2(-1.905,1.95) 3(-0.635,-1.95) 4(-0.635,1.95) 5(0.635,-1.95) 6(0.635,1.95) 7(1.905,-1.95) 8(1.905,1.95)
  silkscreen extent -3.14,-2.02 -2.9,-1.78, body extent -2.54,-2.55 2.54,2.55, height 5.9
434351045816 [mm] "3.5x4.7 mm SMD side push"
  rect 1.2x1 smd: A1(-2.8,0.85) A2(2.8,0.85) B1(-2.8,-0.85) B2(2.8,-0.85)
  silkscreen extent -2.35,-2.75 2.35,1.75, body extent -3.2,-2.75 3.2,1.75, height 1.65
AO-SOT-23-3L_V [mm] "SOT23, 3-Leads, Body 3.1x1.8mm, Pitch 0.95mm"
  rect 0.8x0.8 smd: 1(-1.2,0.95) 2(-1.2,-0.95) 3(1.2,0)
  silkscreen extent -1.33,-1.55 0.9,2.02, body extent -1.5,-1.55 1.5,1.55, height 1.25
C0603 [mm]
  rect 0.64x0.89 smd: 1(-0.7,0) 2(0.7,0)
  silkscreen extent -0.18,-0.56 0.18,0.56, body extent -0.8,-0.4 0.8,0.4, height 0.5
C0805 [mm]
  rect 0.9x1.4 smd: 1(-0.85,0) 2(0.85,0)
  silkscreen extent -0.2,-0.79 0.2,0.79, body extent -1.1,-0.7 1.1,0.7, height 1.35
ESDALC6V1W5 [mm]
  rect 0.4x1.2 smd: 1(-0.65,-0.85) 2(0,-0.85) 3(0.65,-0.85) 4(0.65,0.85) 5(-0.65,0.85)
  silkscreen extent -1.33,-1.28 1.22,0.77, body extent -1.15,-1.05 1.15,1.05, height 1.1
FP-0466-MFG [mil]
  rect 45x80 smd paste+0 mask+0: 1(-52.5,0) 2(52.5,0)
  silkscreen extent -15,-32 15,32, body extent -79,-44 79,44, height 10
FP-APFA2507LQBDSEEZGKC-MFG [mm]
  rect 0.85x0.9 smd paste+0 mask+0: 1(-1.325,-0.25) 4(1.325,-0.25)
  rect 0.45x0.5 smd paste+0 mask+0: 2(-0.425,-0.6) 3(0.425,-0.6)
  silkscreen extent -2.42,-0.38 -2.18,-0.13, body extent -1.25,-0.5 1.25,0.5, height 0.8
FP-DCK0006A-IPC_C [mm]
  rect 1.164x0.336 smd paste+0 mask+0: 1(-0.77,0.65)
  rrect100% 1.164x0.336 smd paste+0 mask+0: 2(-0.77,0) 3(-0.77,-0.65) 4(0.77,-0.65) 5(0.77,0) 6(0.77,0.65)
  silkscreen extent -2.05,-1.25 1.05,1.25
FP-DDA0008A-IPC_B [mm]
  rect 2.174x0.582 smd paste+0 mask+0: 1(-2.366,1.905)
  rrect100% 2.174x0.582 smd paste+0 mask+0: 2(-2.366,0.635) 3(-2.366,-0.635) 4(-2.366,-1.905) 5(2.366,-1.905) 6(2.366,-0.635) 7(2.366,0.635) 8(2.366,1.905)
  rect 2.34x2.34 smd paste-1000 mask+0: 9(0,0)
  silkscreen extent -4.08,-2.45 0.78,2.45, body extent -3,-2.45 3,2.45, height 1.7
FP-DRL0005A-MFG [mm]
  rect 0.45x0.3 smd paste-1000 mask-1000: 1(-0.675,0.5) 2(-0.675,0) 3(-0.675,-0.5) 4(0.675,-0.5) 5(0.675,0.5)
  silkscreen extent -1.67,-1.1 0.65,1.1, body extent -0.8,-0.8 0.8,0.8, height 0.6
FP-DWV0008A-IPC_C [mil]
  rect 65.12x21.34 smd paste+0 mask+0: 1(-204.74,75)
  rrect100% 65.12x21.34 smd paste+0 mask+0: 2(-204.74,25) 3(-204.74,-25) 4(-204.74,-75) 5(204.74,-75) 6(204.74,-25) 7(204.74,25) 8(204.74,75)
  silkscreen extent -273,-115 153,115, body extent -226,-115 226,115, height 110
FP-LTST-C190KRKT-MFG [mm]
  rect 0.8x0.8 smd paste+0: 1(-0.75,0) 2(0.75,0)
  silkscreen extent -0.18,-0.56 0.18,0.56, body extent -1.25,-0.55 1.25,0.55, height 0.25
FP-SOD-523-IPC_C [mil]
  rect 25.95x10.73 smd paste+0 mask+0: 1(-24.67,0)
  rrect100% 25.95x10.73 smd paste+0 mask+0: 2(24.67,0)
  silkscreen extent -68,-26 24,26, body extent -31,-16 31,16, height 28
FP-SOT23-MFG#1 [mm]
  rect 0.9x0.8 smd paste+0 mask+0: 1(-1,0.95) 2(-1,-0.95) 3(1,0)
  silkscreen extent -0.18,-1.5 0.7,1.5, body extent -1.2,-1.45 1.2,1.45, height 1.1
FP-SOT23-MFG#2 [mm]
  rect 0.8x0.8 smd paste+0 mask+0: 1(-1.2,0.95) 2(-1.2,-0.95) 3(1.2,0)
  silkscreen extent -0.9,-1.55 0.9,1.55, body extent -1.7,-1.78 1.7,1.78, height 0.25
FP-TSM-104-01-L-SV-P-TR-MFG [mil]
  rect 50x135 smd paste+0 mask+0: 1(150,-57.5) 2(50,57.5) 3(-50,-57.5) 4(-150,57.5)
  silkscreen extent -200,-93 202,53, body extent -204,-129 204,129, height 10
INDC1608X95N [mm]
  rrect30% 0.9x0.97 smd: 1(-0.785,0) 2(0.785,0)
  silkscreen extent -0.8,-0.66 0.8,0.66, body extent -0.8,-0.4 0.8,0.4, height 0.95
JST-S2B-PH-K-S_V [mm] "THD, 2-Leads, Body 7.6x5.9mm, Pitch 2mm"
  rect 1.2x1.2 hole 0.7: 1(-1,2.45)
  round 1.2 hole 0.7: 2(1,2.45)
  silkscreen extent -2.95,-3.8 2.95,4.35, body extent -2.95,-3.8 2.95,3.8, height 4.8
ONSC-SOD-123FL-2-498_V [mm] "SOD, 2-Leads, Body 2.7x1.65mm"
  rect 1.25x1.22 smd: 1(-1.475,0) 2(1.475,0)
  silkscreen extent -1.6,-0.82 0.45,1.28, body extent -1.35,-0.82 1.35,0.82, height 0.98
QFN50P900X900X100-65N-D [mm]
  rect 0.85x0.3 smd: 1(-4.45,3.75) 2(-4.45,3.25) 3(-4.45,2.75) 4(-4.45,2.25) 5(-4.45,1.75) 6(-4.45,1.25) 7(-4.45,0.75) 8(-4.45,0.25) 9(-4.45,-0.25) 10(-4.45,-0.75) 11(-4.45,-1.25) 12(-4.45,-1.75) 13(-4.45,-2.25) 14(-4.45,-2.75) 15(-4.45,-3.25) 16(-4.45,-3.75) 33(4.45,-3.75) 34(4.45,-3.25) 35(4.45,-2.75) 36(4.45,-2.25) 37(4.45,-1.75) 38(4.45,-1.25) 39(4.45,-0.75) 40(4.45,-0.25) 41(4.45,0.25) 42(4.45,0.75) 43(4.45,1.25) 44(4.45,1.75) 45(4.45,2.25) 46(4.45,2.75) 47(4.45,3.25) 48(4.45,3.75)
  rect 0.3x0.85 smd: 17(-3.75,-4.45) 18(-3.25,-4.45) 19(-2.75,-4.45) 20(-2.25,-4.45) 21(-1.75,-4.45) 22(-1.25,-4.45) 23(-0.75,-4.45) 24(-0.25,-4.45) 25(0.25,-4.45) 26(0.75,-4.45) 27(1.25,-4.45) 28(1.75,-4.45) 29(2.25,-4.45) 30(2.75,-4.45) 31(3.25,-4.45) 32(3.75,-4.45) 49(3.75,4.45) 50(3.25,4.45) 51(2.75,4.45) 52(2.25,4.45) 53(1.75,4.45) 54(1.25,4.45) 55(0.75,4.45) 56(0.25,4.45) 57(-0.25,4.45) 58(-0.75,4.45) 59(-1.25,4.45) 60(-1.75,4.45) 61(-2.25,4.45) 62(-2.75,4.45) 63(-3.25,4.45) 64(-3.75,4.45)
  rect 4.1x4.1 smd: 65(0,0)
  silkscreen extent -5,4.38 -4.75,4.62, body extent -4.55,-4.55 4.55,4.55, height 1
R0603 [mm]
  rect 0.64x1 smd: 1(-0.7,0) 2(0.7,0)
  silkscreen extent -0.15,-0.58 0.15,0.58, body extent -0.9,-0.5 0.9,0.5, height 0.56
R0805 [mil]
  rect 39.69x53.63 smd paste+0: 1(-35.51,0) 2(35.51,0)
  silkscreen extent -8,-30 8,30, body extent -38,-25 40,25, height 24
SHDRRA2W80P0X350_1X2_840X920X825P [mm]
  rect 2.025x2.025 hole 1.35: 1(0,0)
  round 2.025 hole 1.35: 2(3.5,0)
  silkscreen extent -2.45,-1.2 5.95,8, body extent -2.45,-1.2 5.95,8, height 7.25
SHDRRA4W50P0X200_1X4_990X760X480P [mm]
  rect 1.35x1.35 hole 0.9: 1(0,0)
  round 1.35 hole 0.9: 2(-2,0) 3(-4,0) 4(-6,0)
  silkscreen extent -7.95,-1.35 1.95,6.25, body extent -7.95,-1.35 1.95,6.25, height 4.8
SHDRRA5W80P0X350_1X5_1890X920X825P [mm]
  rect 2.025x2.025 hole 1.35: 1(0,0)
  round 2.025 hole 1.35: 2(3.5,0) 3(7,0) 4(10.5,0) 5(14,0)
  silkscreen extent -2.45,-1.2 16.45,8, body extent -2.45,-1.2 16.45,8, height 7.25
SHDRRA6W83P0X350_1X6_2240X920X825P [mm]
  rect 2.025x2.025 hole 1.35: 1(0,0)
  round 2.025 hole 1.35: 2(-3.5,0) 3(-7,0) 4(-10.5,0) 5(-14,0) 6(-17.5,0)
  silkscreen extent -20.05,-1.2 2.55,8.15, body extent -19.95,-1.13 2.45,8.07, height 7.25
SMTC-FTSH-105-01-L-DV-K_V [mm] "CONN, 10-Leads, Body 6.35x3.43mm, Pitch 1.27mm"
  rect 0.74x2.79 smd: 1(-2.54,-2.035) 2(-2.54,2.035) 3(-1.27,-2.035) 4(-1.27,2.035) 5(0,-2.035) 6(0,2.035) 7(1.27,-2.035) 8(1.27,2.035) 9(2.54,-2.035) 10(2.54,2.035)
  silkscreen extent -3.17,-4.1 3.17,0.34, body extent -3.17,-2.92 3.18,2.92, height 6.12
SOD2513X117N [mm]
  rect 1.085x0.55 smd: 1(-1.14,0) 2(1.14,0)
  silkscreen extent -1.68,-0.64 0.83,0.64, body extent -1.25,-0.64 1.25,0.64, height 1.17
SODFL3516X110N [mm]
  rect 1.14x1.04 smd: 1(-1.5,0) 2(1.5,0)
  silkscreen extent -2.07,-0.82 1.3,0.82, body extent -1.75,-0.82 1.75,0.82, height 1.1
SON50P200X200X80-9N [mm]
  rect 0.35x0.3 smd: 1(-1.2,0.75) 2(-1.2,0.25) 3(-1.2,-0.25) 4(-1.2,-0.75) 5(1.2,-0.75) 6(1.2,-0.25) 7(1.2,0.25) 8(1.2,0.75)
  rect 1.7x1 smd: 9(0,0)
  silkscreen extent -1.5,1.27 -1.25,1.52, body extent -1.05,-1 1.05,1, height 0.8
SOT65P210X110-3N [mm]
  rect 1.05x0.5 smd: 1(-1.05,0.65) 2(-1.05,-0.65) 3(1.05,0)
  silkscreen extent -1.58,-1 0.18,1.15, body extent -1.05,-1 1.05,1, height 1.1
SOT65P280X110-8N [mm]
  rect 1.2x0.45 smd: 1(-1.25,0.975) 2(-1.25,0.325) 3(-1.25,-0.325) 4(-1.25,-0.975) 5(1.25,-0.975) 6(1.25,-0.325) 7(1.25,0.325) 8(1.25,0.975)
  silkscreen extent -1.85,-1.45 0.3,1.55, body extent -1.4,-1.45 1.4,1.45, height 1.1
SOT95P280X145-6N [mm]
  rect 1.2x0.6 smd: 1(-1.25,0.95) 2(-1.25,0) 3(-1.25,-0.95) 4(1.25,-0.95) 5(1.25,0) 6(1.25,0.95)
  silkscreen extent -1.85,-1.45 0.3,1.6, body extent -1.4,-1.45 1.4,1.45, height 1.2
SRP7050WA-330M [mm]
  rect 3.05x3.1 smd: 1(-3.05,0) 2(3.05,0)
  silkscreen extent -3.95,-3.65 3.95,3.65, body extent -3.95,-3.65 3.95,3.65, height 5.4
Test_Point_45 [mil]
  round 45 smd: 1(0,0)
  silkscreen extent -29,-29 30,29
Test_Point_50 [mil]
  round 50 smd: 1(0,0)
  silkscreen extent -34,-34 34,34
TPSM863253RDXR [mm]
  rect 0.5x0.5 smd paste-1 mask+0: 1(-1.362,1.338) 2(-1.15,-0.675) 3(1.15,-0.675) 4(1.362,1.338)
  rrect50% 0.22x0.6 smd mask+0: 5(0.5,1.9) 6(0,1.9) 7(-0.5,1.9)
  Top Layer region: 205 vertices and 0 holes, not listed, extent 0.255,0.725 1.9,1.9
  Top Layer region: 205 vertices and 0 holes, not listed, extent -1.9,0.725 -0.255,1.9
  Top Layer region: 1.81,0.474 1.816,0.474 1.821,0.473 1.826,0.472 1.831,0.47 1.836,0.468 1.841,0.466 1.845,0.464 1.85,0.462 1.854,0.459 1.859,0.456 1.863,0.453 1.867,0.449 1.871,0.446 1.874,0.442 1.878,0.438 1.881,0.434 1.884,0.429 1.887,0.425 1.889,0.42 1.891,0.416 1.893,0.411 1.895,0.406 1.897,0.401 1.898,0.396 1.899,0.391 1.899,0.385 1.9,0.38 1.9,0.375 1.9,-1.725 1.9,-1.73 1.899,-1.735 1.899,-1.741 1.898,-1.746 1.897,-1.751 1.895,-1.756 1.893,-1.761 1.891,-1.766 1.889,-1.77 1.887,-1.775 1.884,-1.779 1.881,-1.784 1.878,-1.788 1.874,-1.792 1.871,-1.796 1.867,-1.799 1.863,-1.803 1.859,-1.806 1.854,-1.809 1.85,-1.812 1.845,-1.814 1.841,-1.816 1.836,-1.818 1.831,-1.82 1.826,-1.822 1.821,-1.823 1.816,-1.824 1.81,-1.824 1.805,-1.825 0.495,-1.825 0.49,-1.824 0.484,-1.824 0.479,-1.823 0.474,-1.822 0.469,-1.82 0.464,-1.818 0.459,-1.816 0.455,-1.814 0.45,-1.812 0.446,-1.809 0.441,-1.806 0.437,-1.803 0.433,-1.799 0.429,-1.796 0.426,-1.792 0.422,-1.788 0.419,-1.784 0.416,-1.779 0.413,-1.775 0.411,-1.77 0.409,-1.766 0.407,-1.761 0.405,-1.756 0.403,-1.751 0.402,-1.746 0.401,-1.741 0.401,-1.735 0.4,-1.73 0.4,-1.725 0.4,0.375 0.4,0.38 0.401,0.385 0.401,0.391 0.402,0.396 0.403,0.401 0.405,0.406 0.407,0.411 0.409,0.416 0.411,0.42 0.413,0.425 0.416,0.429 0.419,0.434 0.422,0.438 0.426,0.442 0.429,0.446 0.433,0.449 0.437,0.453 0.441,0.456 0.446,0.459 0.45,0.462 0.455,0.464 0.459,0.466 0.464,0.468 0.469,0.47 0.474,0.472 0.479,0.473 0.484,0.474 0.49,0.474 0.495,0.475 1.805,0.475
  Top Layer region: -0.49,0.474 -0.484,0.474 -0.479,0.473 -0.474,0.472 -0.469,0.47 -0.464,0.468 -0.459,0.466 -0.455,0.464 -0.45,0.462 -0.446,0.459 -0.441,0.456 -0.437,0.453 -0.433,0.449 -0.429,0.446 -0.426,0.442 -0.422,0.438 -0.419,0.434 -0.416,0.429 -0.413,0.425 -0.411,0.42 -0.409,0.416 -0.407,0.411 -0.405,0.406 -0.403,0.401 -0.402,0.396 -0.401,0.391 -0.401,0.385 -0.4,0.38 -0.4,0.375 -0.4,-1.725 -0.4,-1.73 -0.401,-1.735 -0.401,-1.741 -0.402,-1.746 -0.403,-1.751 -0.405,-1.756 -0.407,-1.761 -0.409,-1.766 -0.411,-1.77 -0.413,-1.775 -0.416,-1.779 -0.419,-1.784 -0.422,-1.788 -0.426,-1.792 -0.429,-1.796 -0.433,-1.799 -0.437,-1.803 -0.441,-1.806 -0.446,-1.809 -0.45,-1.812 -0.455,-1.814 -0.459,-1.816 -0.464,-1.818 -0.469,-1.82 -0.474,-1.822 -0.479,-1.823 -0.484,-1.824 -0.49,-1.824 -0.495,-1.825 -1.805,-1.825 -1.81,-1.824 -1.816,-1.824 -1.821,-1.823 -1.826,-1.822 -1.831,-1.82 -1.836,-1.818 -1.841,-1.816 -1.845,-1.814 -1.85,-1.812 -1.854,-1.809 -1.859,-1.806 -1.863,-1.803 -1.867,-1.799 -1.871,-1.796 -1.874,-1.792 -1.878,-1.788 -1.881,-1.784 -1.884,-1.779 -1.887,-1.775 -1.889,-1.77 -1.891,-1.766 -1.893,-1.761 -1.895,-1.756 -1.897,-1.751 -1.898,-1.746 -1.899,-1.741 -1.899,-1.735 -1.9,-1.73 -1.9,-1.725 -1.9,0.375 -1.9,0.38 -1.899,0.385 -1.899,0.391 -1.898,0.396 -1.897,0.401 -1.895,0.406 -1.893,0.411 -1.891,0.416 -1.889,0.42 -1.887,0.425 -1.884,0.429 -1.881,0.434 -1.878,0.438 -1.874,0.442 -1.871,0.446 -1.867,0.449 -1.863,0.453 -1.859,0.456 -1.854,0.459 -1.85,0.462 -1.845,0.464 -1.841,0.466 -1.836,0.468 -1.831,0.47 -1.826,0.472 -1.821,0.473 -1.816,0.474 -1.81,0.474 -1.805,0.475 -0.495,0.475
  silkscreen extent -2.6,-2.17 1.65,2.25, body extent -1.65,-2 1.65,2, height 2.1
triple_solder_jumper [mm]
  rect 0.64x1 smd: 1(-1.4,0) 2(0,0) 3(1.4,0)
  silkscreen extent -0.85,-0.58 0.85,0.58, body extent -1.61,-0.5 1.61,0.5, height 0.56
VISH-SOIC-8_C_V [mm] "SOIC, 8-Leads, Body 6x4mm, Pitch 1.27mm"
  rect 1.14x0.91 smd: 1(-2.73,1.905) 2(-2.73,0.635) 3(-2.73,-0.635) 4(-2.73,-1.905) 5(2.73,-1.905) 6(2.73,-0.635) 7(2.73,0.635) 8(2.73,1.905)
  silkscreen extent -2.85,-3 1.75,3.03, body extent -3,-3 3,3, height 3.46
WCAP-CSGP_1210_L3.2W2.5H2.5 [mm] "Ceramic Capacitors, body 3.2x2.5mm"
  rect 0.9x2.5 smd: 1(-1.55,0) 2(1.55,0)
  silkscreen extent -0.75,-1.4 0.75,1.4, body extent -1.6,-1.25 1.6,1.25, height 2.5
WE-CBF_0805_L2W1.2H0.9_HC [mm] "SMD EMI Suppression Ferrite  Bead, body 2.00x1.20mm"
  rect 1.4x1 smd: 1(-1.3,0) 2(1.3,0)
  body extent -1,-0.6 1,0.6, height 0.9
WE-PD_7332 [mm] "SMT Shielded Power Inductor, 2-leads, body 7.3x7.3mm"
  rect 1.6x2.2 smd: 1(-3.2,0) 2(3.2,0)
  Top Layer keep-out region: -3.65,-3.65 -3.65,-1.3 -2.2,-1.3 -2.2,1.3 -3.65,1.3 -3.65,3.65 3.65,3.65 3.65,1.3 2.2,1.3 2.2,-1.3 3.65,-1.3 3.65,-3.65
  silkscreen extent -4.62,-3.75 3.75,3.75, body extent -3.65,-3.65 3.65,3.65, height 3.12
XTAL_ABM11W-24.0000MHZ-8-D1X-T3 [mm]
  rect 0.775x0.875 smd: 1(-0.487,0.637) 2(-0.487,-0.637) 3(0.487,-0.637) 4(0.487,0.637)
  silkscreen extent -1.72,0.54 -1.53,0.74, body extent -1,-0.8 1,0.8, height 0.5

## Part data
C1 C23 C25 C27 C30 C31 C32 C34 C37 C38 C40 C41 C49 C51 C60 C61 C62 C63 C64 C65 C71: library part GCM188R71E104JA57D, "CAP CER 0.1UF 25V X7R 0603 / 0.1 μF ±5% 25V Ceramic Capacitor X7R 0603 (1608 Metric)", Case/Package=0603, Dielectric Material=Ceramic, Manufacturer=Murata, Manufacturer Lifecycle Status=NRND, Manufacturer_Name="Murata Electronics", Max Operating Temperature=125°C, Min Operating Temperature=-55°C, Mouser Part Number=81-GCM188R71E104JAD, Ratings=AEC-Q200, Supplier Part Number=490-GCM188R71E104JA57DCT-ND, Voltage Rating (DC)=25V, Arrow Part Number=GCM188R71E104JA57D, Arrow Price/Stock=https://www.arrow.com/en/products/gcm188r71e104ja57d/murata-manufacturing, Category="Ceramic Capacitors", ComponentLink1Description=https://datasheet.octopart.com:443/GCM188R71E104JA57D-Murata-datasheet-141267551.pdf?src-supplier=Geoflip, ComponentLink1URL=https://datasheet.octopart.com:443/GCM188R71E104JA57D-Murata-datasheet-141267551.pdf?src-supplier=Geoflip, ComponentLink2Description=https://datasheet.octopart.com:443/GCM188R71E104JA57D-Murata-datasheet-140658663.pdf?src-supplier=Ciiva, ComponentLink2URL=https://datasheet.octopart.com:443/GCM188R71E104JA57D-Murata-datasheet-140658663.pdf?src-supplier=Ciiva, ComponentLink3Description=https://datasheet.octopart.com:443/GCM188R71E104JA57D-Murata-datasheet-138718229.pdf?src-supplier=Ciiva, ComponentLink3URL=https://datasheet.octopart.com:443/GCM188R71E104JA57D-Murata-datasheet-138718229.pdf?src-supplier=Ciiva, ComponentLink4Description=http://sigma.octopart.com:80/reach_statement/Murata-company-16.pdf?src-supplier=Compliance+Statements, ComponentLink4URL=http://sigma.octopart.com:80/reach_statement/Murata-company-16.pdf?src-supplier=Compliance+Statements, Country of Origin=Philippines, Datasheet Link=https://search.murata.co.jp/Ceramy/image/img/A01X/G101/ENG/GCM188R71E104JA57-01A.pdf, Export Control Classification Number (ECCN) Code=EAR99, Harmonized Tariff Schedule (HTS) Code=8532.24.00.20, Height=0.9mm, Introduction Date=2013-11-20, Length=1.6mm, Lifecycle Status=NRND, Manufacturer Part Number=GCM188R71E104JA57D, Manufacturer_Part_Number=GCM188R71E104JA57D, Mounting Technology="Surface Mount", Mouser Price/Stock=https://www.mouser.co.uk/ProductDetail/Murata-Electronics/GCM188R71E104JA57D?qs=ui%252B2d9lVEI5lLkZDVYlCng%3D%3D, Number of Terminals=2, Pricing="1=0,33, 10=0,196, 50=0,1434, 100=0,1272, 500=0,09986, 1000=0,09143 (USD)", REACH SVHC=Yes, RoHS=Compliant, Schedule B="8532240020, 8532240020|8532240020|8532240020|8532240020|8532240020", Stock=2875, Supplier=DigiKey, Thickness=800µm, Width=800µm
C2 C10 C11 C20: library part CMP-03913-104794504-2, "Cap, 2.2Uf, 100V, Mlcc, 1210 Rohs Compliant: Yes 885012209071", Insulation Resistance=50MΩ, Max Operating Temperature=125°C, Min Operating Temperature=-55°C, Voltage Rating=100V, Height=2.5mm, Length=3.2mm, RoHS=Compliant, Width=2.5mm
C3 C4 C5 C9 C19 C21 C33 C35 C50 C53 C56: library part GRM21BZ71E475KE15L, "25V 4.7uF X7R ±10% 0805 Multilayer Ceramic Capacitors MLCC - SMD/SMT ROHS", Case/Package=0805, Dielectric Material=Ceramic, Manufacturer=Murata, Manufacturer Lifecycle Status="IN PRODUCTION", Manufacturer_Name="Murata Electronics", Max Operating Temperature=125°C, Min Operating Temperature=-55°C, Mouser Part Number=81-GRM21BZ71E475KE5L, Supplier Part Number=2478136, Tolerance=10%, Voltage Rating=25V, Arrow Part Number=GRM21BZ71E475KE15L, Arrow Price/Stock=https://www.arrow.com/en/products/grm21bz71e475ke15l/murata-manufacturing?utm_currency=USD&region=nac, Category="Ceramic Capacitors", ComponentLink1Description=https://datasheet.octopart.com:443/GRM21BZ71E475KE15L-Murata-datasheet-155345087.pdf?src-supplier=Newark, ComponentLink1URL=https://datasheet.octopart.com:443/GRM21BZ71E475KE15L-Murata-datasheet-155345087.pdf?src-supplier=Newark, ComponentLink2Description=https://datasheet.octopart.com:443/GRM21BZ71E475KE15L-Murata-datasheet-141278877.pdf?src-supplier=Geoflip, ComponentLink2URL=https://datasheet.octopart.com:443/GRM21BZ71E475KE15L-Murata-datasheet-141278877.pdf?src-supplier=Geoflip, ComponentLink3Description=https://datasheet.octopart.com:443/GRM21BZ71E475KE15L-Murata-datasheet-165579666.pdf?src-supplier=TME, ComponentLink3URL=https://datasheet.octopart.com:443/GRM21BZ71E475KE15L-Murata-datasheet-165579666.pdf?src-supplier=TME, ComponentLink4Description=https://datasheet.octopart.com:443/GRM21BZ71E475KE15L-Murata-datasheet-140707839.pdf?src-supplier=Ciiva, ComponentLink4URL=https://datasheet.octopart.com:443/GRM21BZ71E475KE15L-Murata-datasheet-140707839.pdf?src-supplier=Ciiva, ComponentLink5Description=https://datasheet.octopart.com:443/GRM21BZ71E475KE15L-Murata-datasheet-138745135.pdf?src-supplier=Ciiva, ComponentLink5URL=https://datasheet.octopart.com:443/GRM21BZ71E475KE15L-Murata-datasheet-138745135.pdf?src-supplier=Ciiva, ComponentLink6Description=http://sigma.octopart.com:80/reach_statement/Murata-company-16.pdf?src-supplier=Compliance+Statements, ComponentLink6URL=http://sigma.octopart.com:80/reach_statement/Murata-company-16.pdf?src-supplier=Compliance+Statements, Datasheet Link=https://search.murata.co.jp/Ceramy/image/img/A01X/G101/ENG/GRM21BZ71E475KE15-01A.pdf, Export Control Classification Number (ECCN) Code=EAR99, Harmonized Tariff Schedule (HTS) Code=8532.24.00.20, Height=1.45mm, Introduction Date=2017-02-22, Length=2mm, Lifecycle Status=Production, Manufacturer Part Number=GRM21BZ71E475KE15L, Manufacturer_Part_Number=GRM21BZ71E475KE15L, Material=Ceramic, Mounting Technology="Surface Mount", Mouser Price/Stock=https://www.mouser.co.uk/ProductDetail/Murata-Electronics/GRM21BZ71E475KE15L?qs=Ey7%2FXF42M3feXnDNgc%252BFlQ%3D%3D, Number of Terminals=2, REACH SVHC=Yes, RoHS=Compliant, Stock=4700, Supplier=RS, Thickness=1.25mm, Voltage Rating (DC)=25V, Width=1.25mm
C6 C7: library part CC0603FRNPO8BN120, "Ceramic Capacitor, YES, Ceramic, 25V, 1% +Tol, 1% -Tol, C0G, 30ppm/Cel TC, 0.000012uF, Surface Mount, 0603", Arrow Part Number=GCM188R71E104JA57D, Case/Package=0603, Dielectric=C0G, Dielectric Material=Ceramic, Manufacturer=Murata, Manufacturer Lifecycle Status=NRND, Manufacturer_Name="Murata Electronics", Max Operating Temperature=125°C, Min Operating Temperature=-55°C, Mouser Part Number=81-GCM188R71E104JAD, Ratings=AEC-Q200, Supplier Part Number=490-GCM188R71E104JA57DCT-ND, Tolerance=1%, Voltage Rating (DC)=25V, Arrow Price/Stock=https://www.arrow.com/en/products/gcm188r71e104ja57d/murata-manufacturing, Category="Ceramic Capacitors", China RoHS=Compliant, ComponentLink1Description=https://datasheet.octopart.com:443/GCM188R71E104JA57D-Murata-datasheet-141267551.pdf?src-supplier=Geoflip, ComponentLink1URL=https://datasheet.octopart.com:443/GCM188R71E104JA57D-Murata-datasheet-141267551.pdf?src-supplier=Geoflip, ComponentLink2Description=https://datasheet.octopart.com:443/GCM188R71E104JA57D-Murata-datasheet-140658663.pdf?src-supplier=Ciiva, ComponentLink2URL=https://datasheet.octopart.com:443/GCM188R71E104JA57D-Murata-datasheet-140658663.pdf?src-supplier=Ciiva, ComponentLink3Description=https://datasheet.octopart.com:443/GCM188R71E104JA57D-Murata-datasheet-138718229.pdf?src-supplier=Ciiva, ComponentLink3URL=https://datasheet.octopart.com:443/GCM188R71E104JA57D-Murata-datasheet-138718229.pdf?src-supplier=Ciiva, ComponentLink4Description=http://sigma.octopart.com:80/reach_statement/Murata-company-16.pdf?src-supplier=Compliance+Statements, ComponentLink4URL=http://sigma.octopart.com:80/reach_statement/Murata-company-16.pdf?src-supplier=Compliance+Statements, ComponentLink5Description=https://datasheet.octopart.com:443/CC0603FRNPO8BN120-Yageo-datasheet-182140217.pdf?src-supplier=IHS, ComponentLink5URL=https://datasheet.octopart.com:443/CC0603FRNPO8BN120-Yageo-datasheet-182140217.pdf?src-supplier=IHS, ComponentLink6Description=http://sigma.octopart.com:80/conflict_mineral_statement/Yageo-company-3.pdf?src-supplier=Compliance+Statements, ComponentLink6URL=http://sigma.octopart.com:80/conflict_mineral_statement/Yageo-company-3.pdf?src-supplier=Compliance+Statements, ComponentLink7Description=http://sigma.octopart.com:80/rohs_statement/Yageo-company-2.pdf?src-supplier=Compliance+Statements, ComponentLink7URL=http://sigma.octopart.com:80/rohs_statement/Yageo-company-2.pdf?src-supplier=Compliance+Statements, Country of Origin=Philippines, Datasheet Link=https://search.murata.co.jp/Ceramy/image/img/A01X/G101/ENG/GCM188R71E104JA57-01A.pdf, Export Control Classification Number (ECCN) Code=EAR99, Harmonized Tariff Schedule (HTS) Code=8532.24.00.20, Height=0.9mm, Introduction Date=2013-11-20, Length=1.6mm, Lifecycle Status=NRND, Manufacturer Part Number=GCM188R71E104JA57D, Manufacturer_Part_Number=GCM188R71E104JA57D, Mounting Technology="Surface Mount", Mouser Price/Stock=https://www.mouser.co.uk/ProductDetail/Murata-Electronics/GCM188R71E104JA57D?qs=ui%252B2d9lVEI5lLkZDVYlCng%3D%3D, Number of Terminals=2, Pricing="1=0,33, 10=0,196, 50=0,1434, 100=0,1272, 500=0,09986, 1000=0,09143 (USD)", REACH SVHC=Yes, RoHS=Compliant, Schedule B="8532240020, 8532240020|8532240020|8532240020|8532240020|8532240020", Stock=2875, Supplier=DigiKey, Thickness=800µm, Width=800µm
C8 C12 C13 C42 C43 C44: library part GCM188R71E102KA37D, "Cap Ceramic 0.001uF 25V X7R 10% Pad SMD 0603 125C Automotive T/R", Arrow Part Number=GCM188R71E104JA57D, Case Code (Imperial)=0603, Case Code (Metric)=1608, Dielectric=X7R, Dielectric Material=Ceramic, Manufacturer=Murata, Manufacturer Lifecycle Status=NRND, Manufacturer_Name="Murata Electronics", Max Operating Temperature=125°C, Min Operating Temperature=-55°C, Mouser Part Number=81-GCM188R71E104JAD, Ratings=AEC-Q200, Supplier Part Number=490-GCM188R71E104JA57DCT-ND, Tolerance=10%, Voltage Rating=25V, Arrow Price/Stock=https://www.arrow.com/en/products/gcm188r71e104ja57d/murata-manufacturing, Case/Package=0603, Category="Ceramic Capacitors", ComponentLink1Description=https://datasheet.octopart.com:443/GCM188R71E104JA57D-Murata-datasheet-141267551.pdf?src-supplier=Geoflip, ComponentLink1URL=https://datasheet.octopart.com:443/GCM188R71E104JA57D-Murata-datasheet-141267551.pdf?src-supplier=Geoflip, ComponentLink2Description=https://datasheet.octopart.com:443/GCM188R71E104JA57D-Murata-datasheet-140658663.pdf?src-supplier=Ciiva, ComponentLink2URL=https://datasheet.octopart.com:443/GCM188R71E104JA57D-Murata-datasheet-140658663.pdf?src-supplier=Ciiva, ComponentLink3Description=https://datasheet.octopart.com:443/GCM188R71E104JA57D-Murata-datasheet-138718229.pdf?src-supplier=Ciiva, ComponentLink3URL=https://datasheet.octopart.com:443/GCM188R71E104JA57D-Murata-datasheet-138718229.pdf?src-supplier=Ciiva, ComponentLink4Description=http://sigma.octopart.com:80/reach_statement/Murata-company-16.pdf?src-supplier=Compliance+Statements, ComponentLink4URL=http://sigma.octopart.com:80/reach_statement/Murata-company-16.pdf?src-supplier=Compliance+Statements, ComponentLink5Description=https://datasheet.octopart.com:443/GCM188R71E102KA37D-Murata-datasheet-141267546.pdf?src-supplier=Geoflip, ComponentLink5URL=https://datasheet.octopart.com:443/GCM188R71E102KA37D-Murata-datasheet-141267546.pdf?src-supplier=Geoflip, ComponentLink6Description=https://datasheet.octopart.com:443/GCM188R71E102KA37D-Murata-datasheet-140658658.pdf?src-supplier=Ciiva, ComponentLink6URL=https://datasheet.octopart.com:443/GCM188R71E102KA37D-Murata-datasheet-140658658.pdf?src-supplier=Ciiva, ComponentLink7Description=https://datasheet.octopart.com:443/GCM188R71E102KA37D-Murata-datasheet-138718224.pdf?src-supplier=Ciiva, ComponentLink7URL=https://datasheet.octopart.com:443/GCM188R71E102KA37D-Murata-datasheet-138718224.pdf?src-supplier=Ciiva, ComponentLink8Description=https://datasheet.octopart.com/GCM188R71E102KA37D-Murata-datasheet-14404865.pdf, ComponentLink8URL=https://datasheet.octopart.com/GCM188R71E102KA37D-Murata-datasheet-14404865.pdf, Country of Origin=Philippines, Datasheet Link=https://search.murata.co.jp/Ceramy/image/img/A01X/G101/ENG/GCM188R71E104JA57-01A.pdf, Depth=800µm, Export Control Classification Number (ECCN) Code=EAR99, Harmonized Tariff Schedule (HTS) Code=8532.24.00.20, Height=0.9mm, Introduction Date=2013-11-20, Length=1.6mm, Lifecycle Status=NRND, Manufacturer Part Number=GCM188R71E104JA57D, Manufacturer_Part_Number=GCM188R71E104JA57D, Mounting Technology="Surface Mount", Mouser Price/Stock=https://www.mouser.co.uk/ProductDetail/Murata-Electronics/GCM188R71E104JA57D?qs=ui%252B2d9lVEI5lLkZDVYlCng%3D%3D, Number of Terminals=2, Packaging="Tape & Reel", Pricing="1=0,33, 10=0,196, 50=0,1434, 100=0,1272, 500=0,09986, 1000=0,09143 (USD)", Radiation Hardening=No, REACH SVHC=Yes, RoHS=Compliant, Schedule B="8532240020, 8532240020|8532240020|8532240020|8532240020|8532240020", Stock=2875, Supplier=DigiKey, Termination=SMD/SMT, Thickness=800µm, Voltage Rating (DC)=25V, Width=800µm